# Altium PCB Pukk-Display-Module-v1.0.PcbDoc (part 1 of 5)
Units mil, origin at the board's own origin, x right, y up, seen from the top; angles counter-clockwise.
Board outline 3740.16 x 1574.8 mil, 4 copper layers (Top Layer, GND, POWER, Bottom Layer), stack 61.653 mil thick; 157 components, 115 nets, 640 pads, 314 vias.
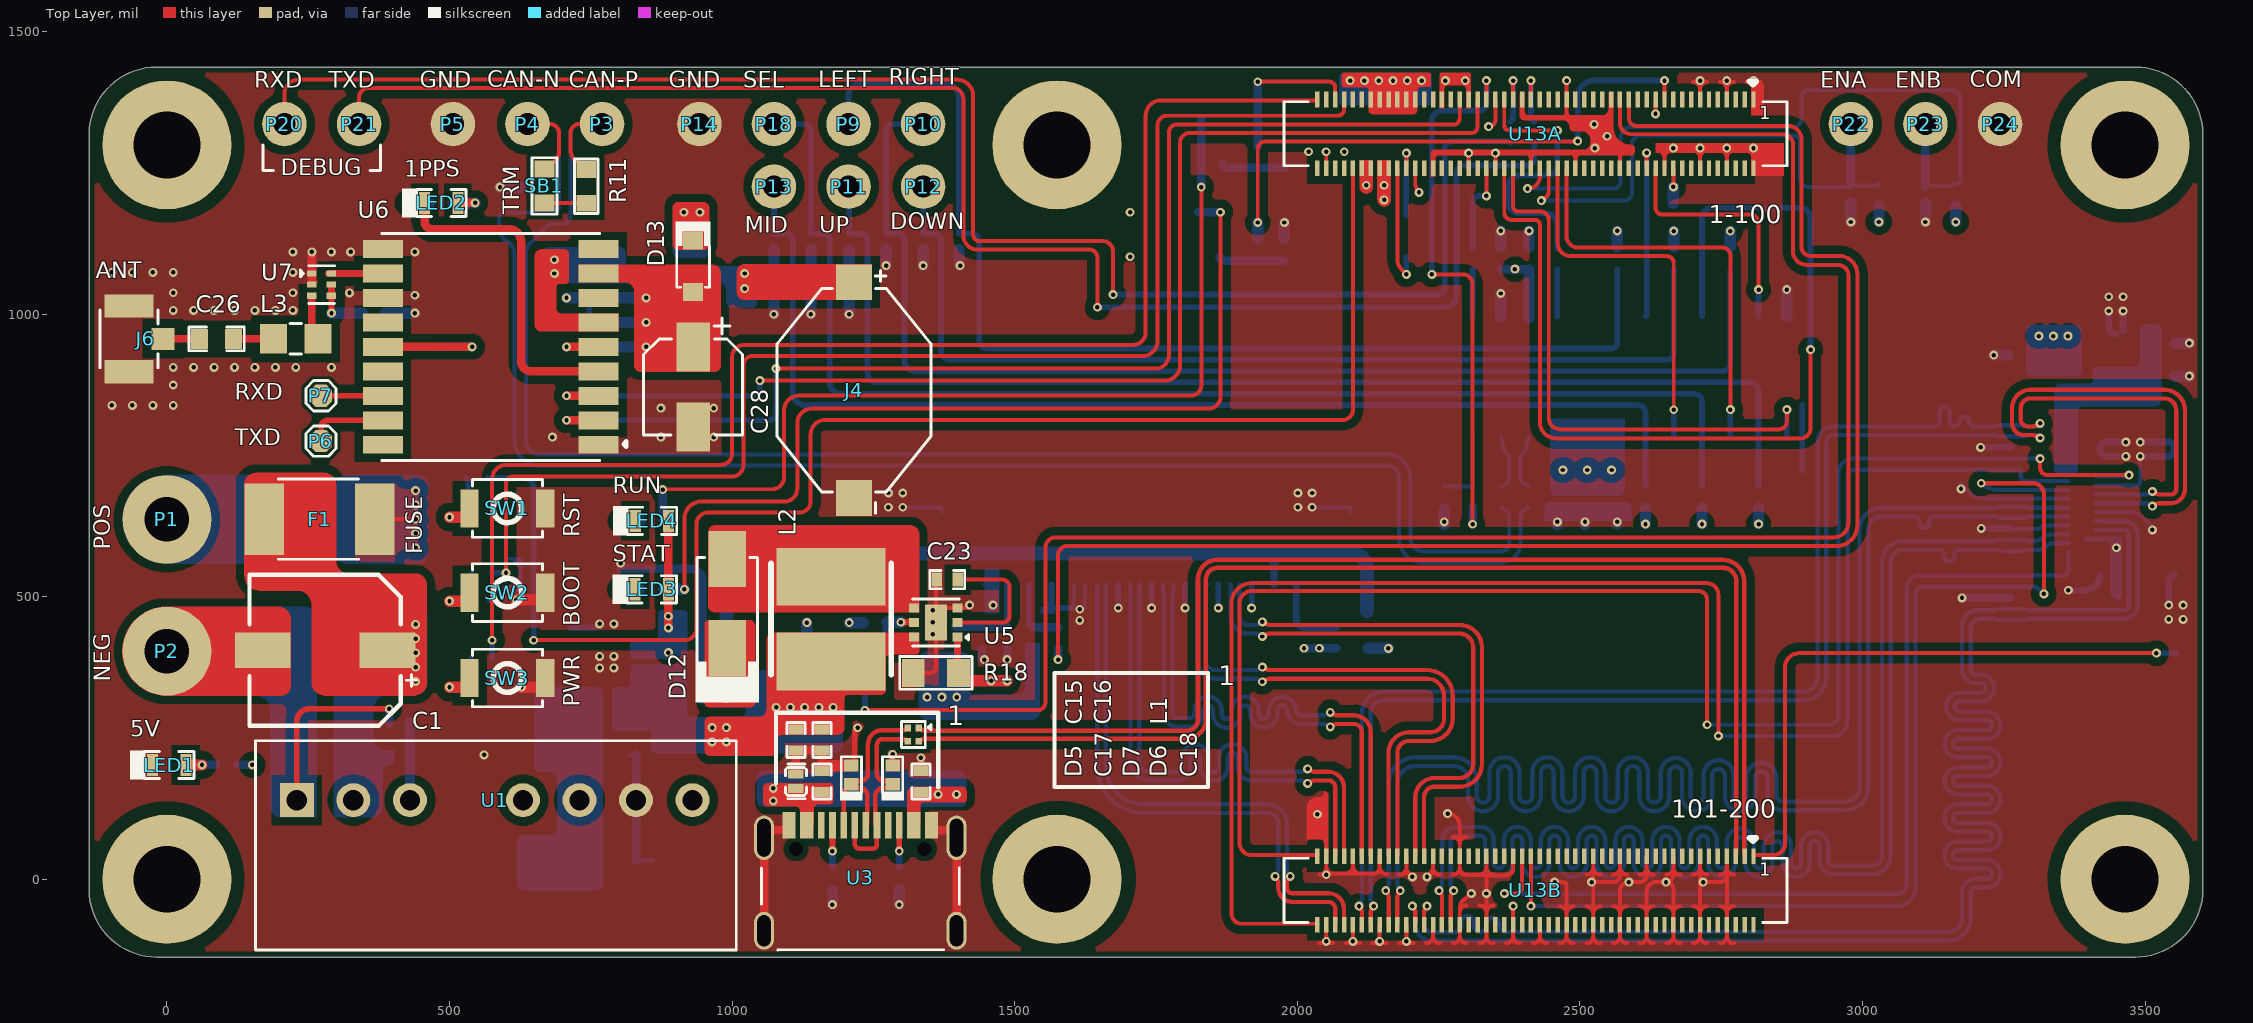
[diagram p0: Top Layer view]
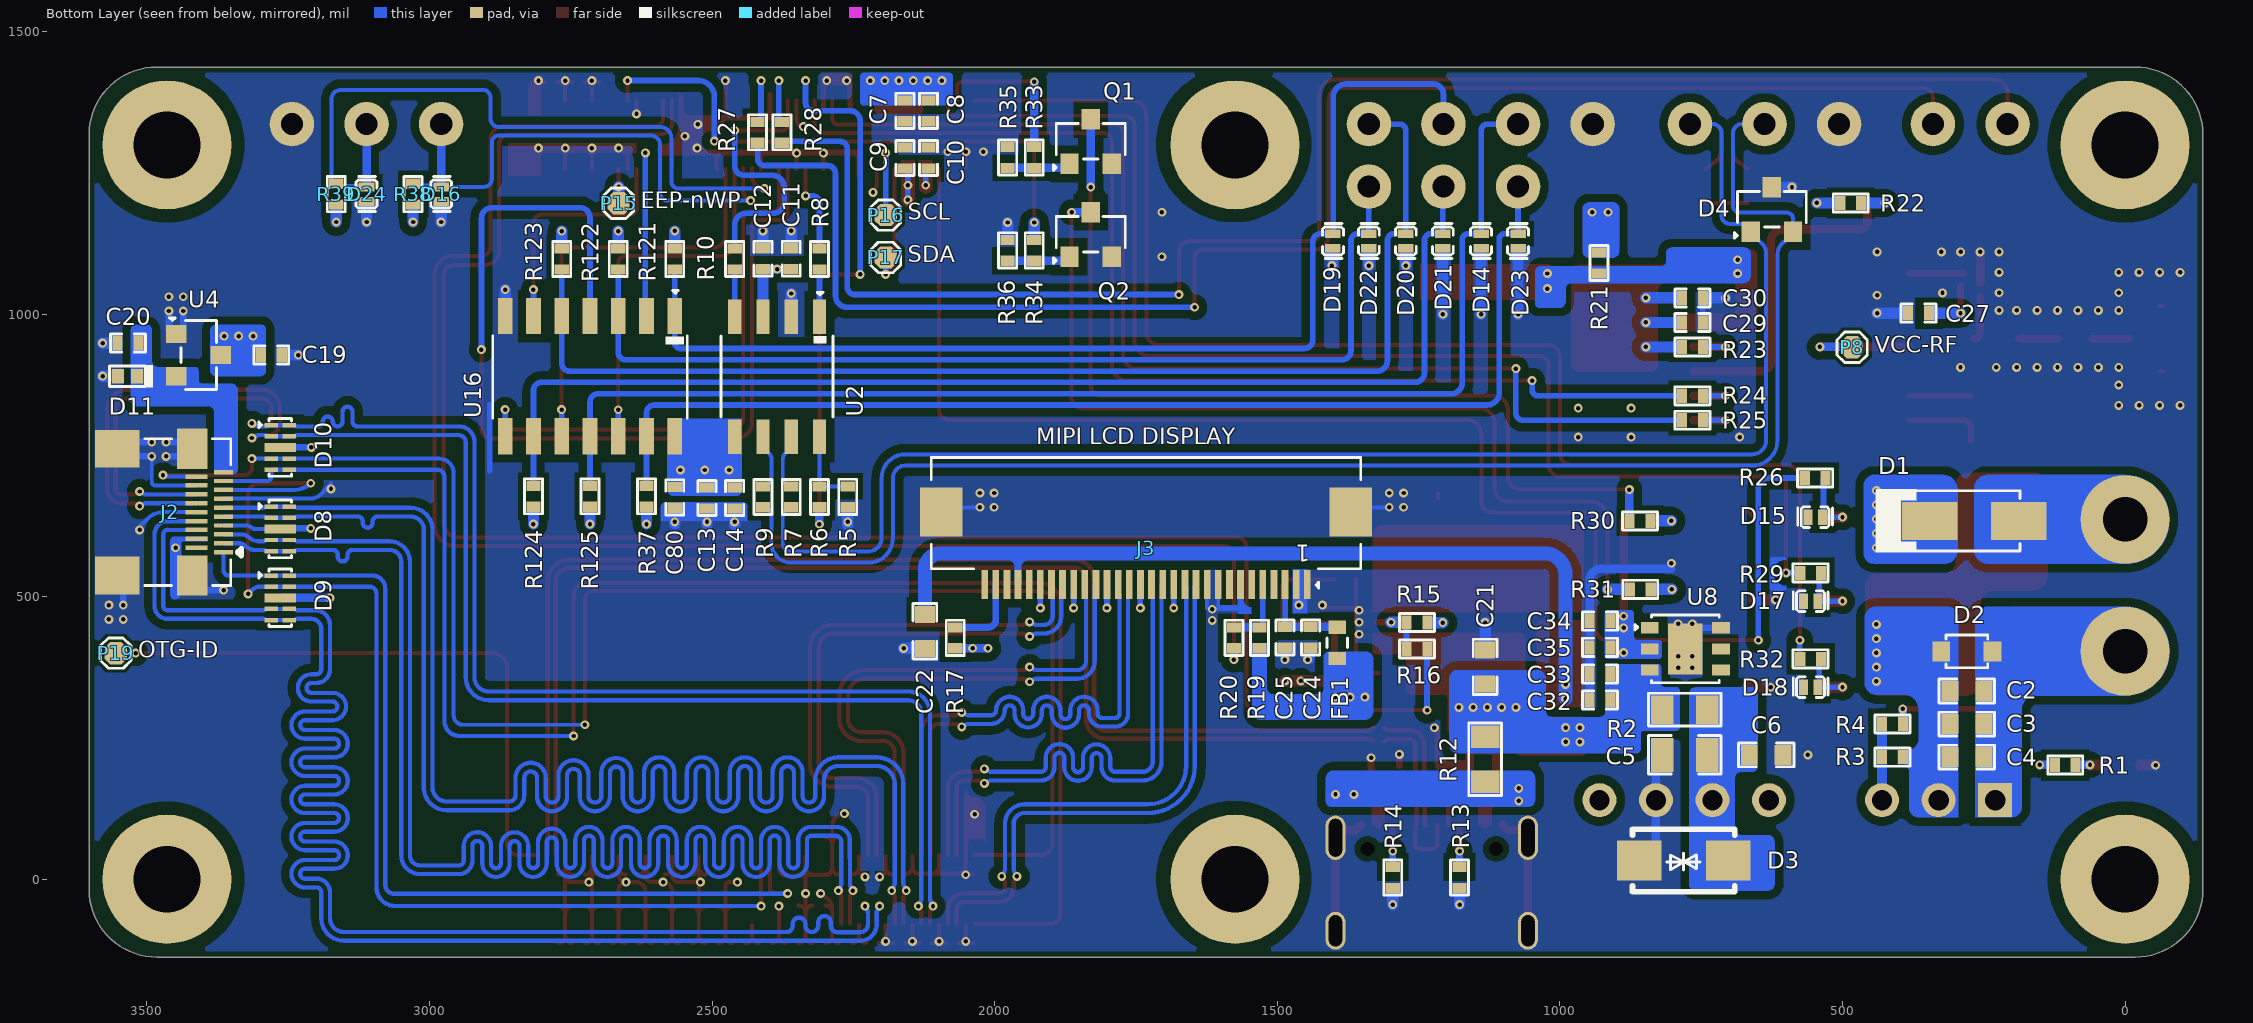
[diagram p1: Bottom Layer view, seen from below]
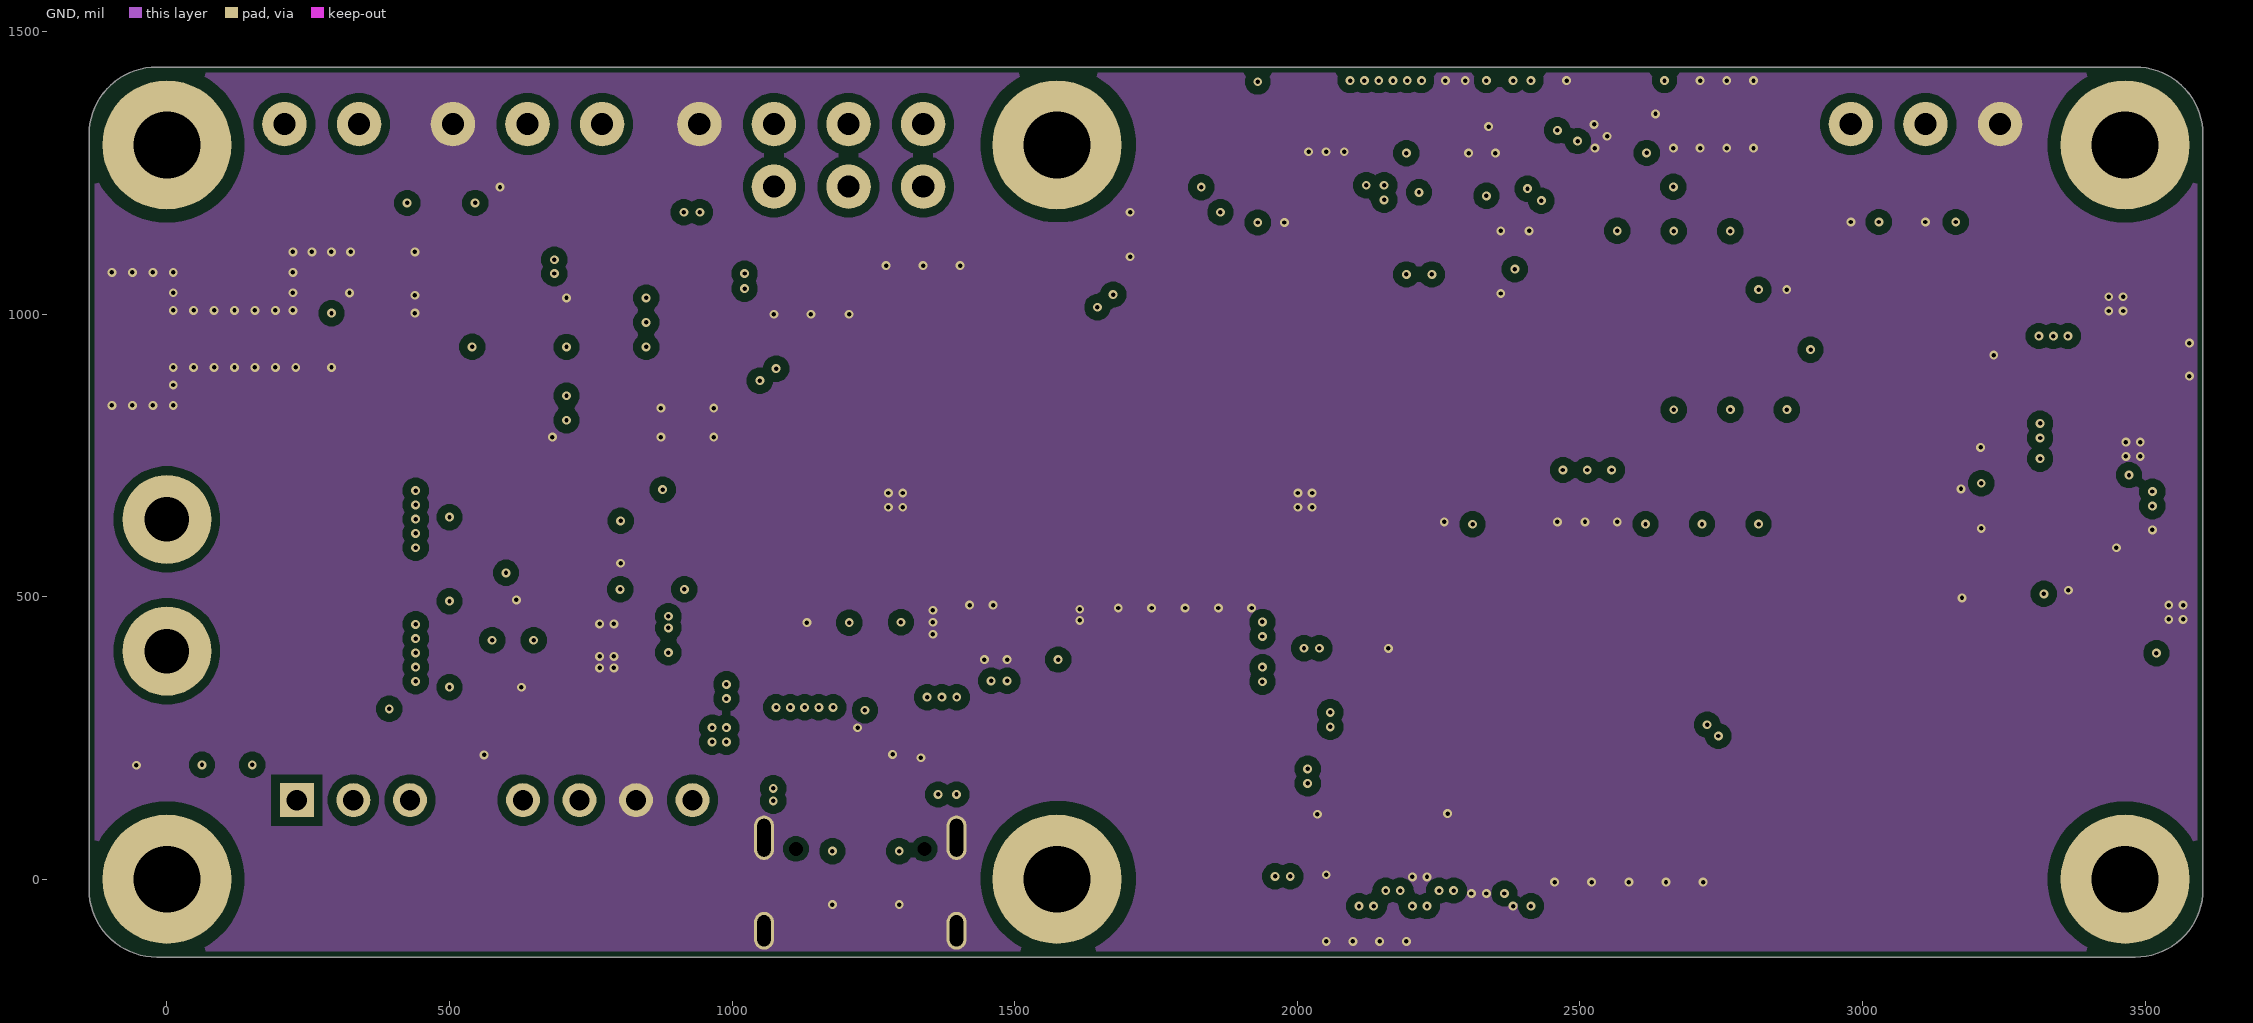
[diagram p2: GND]
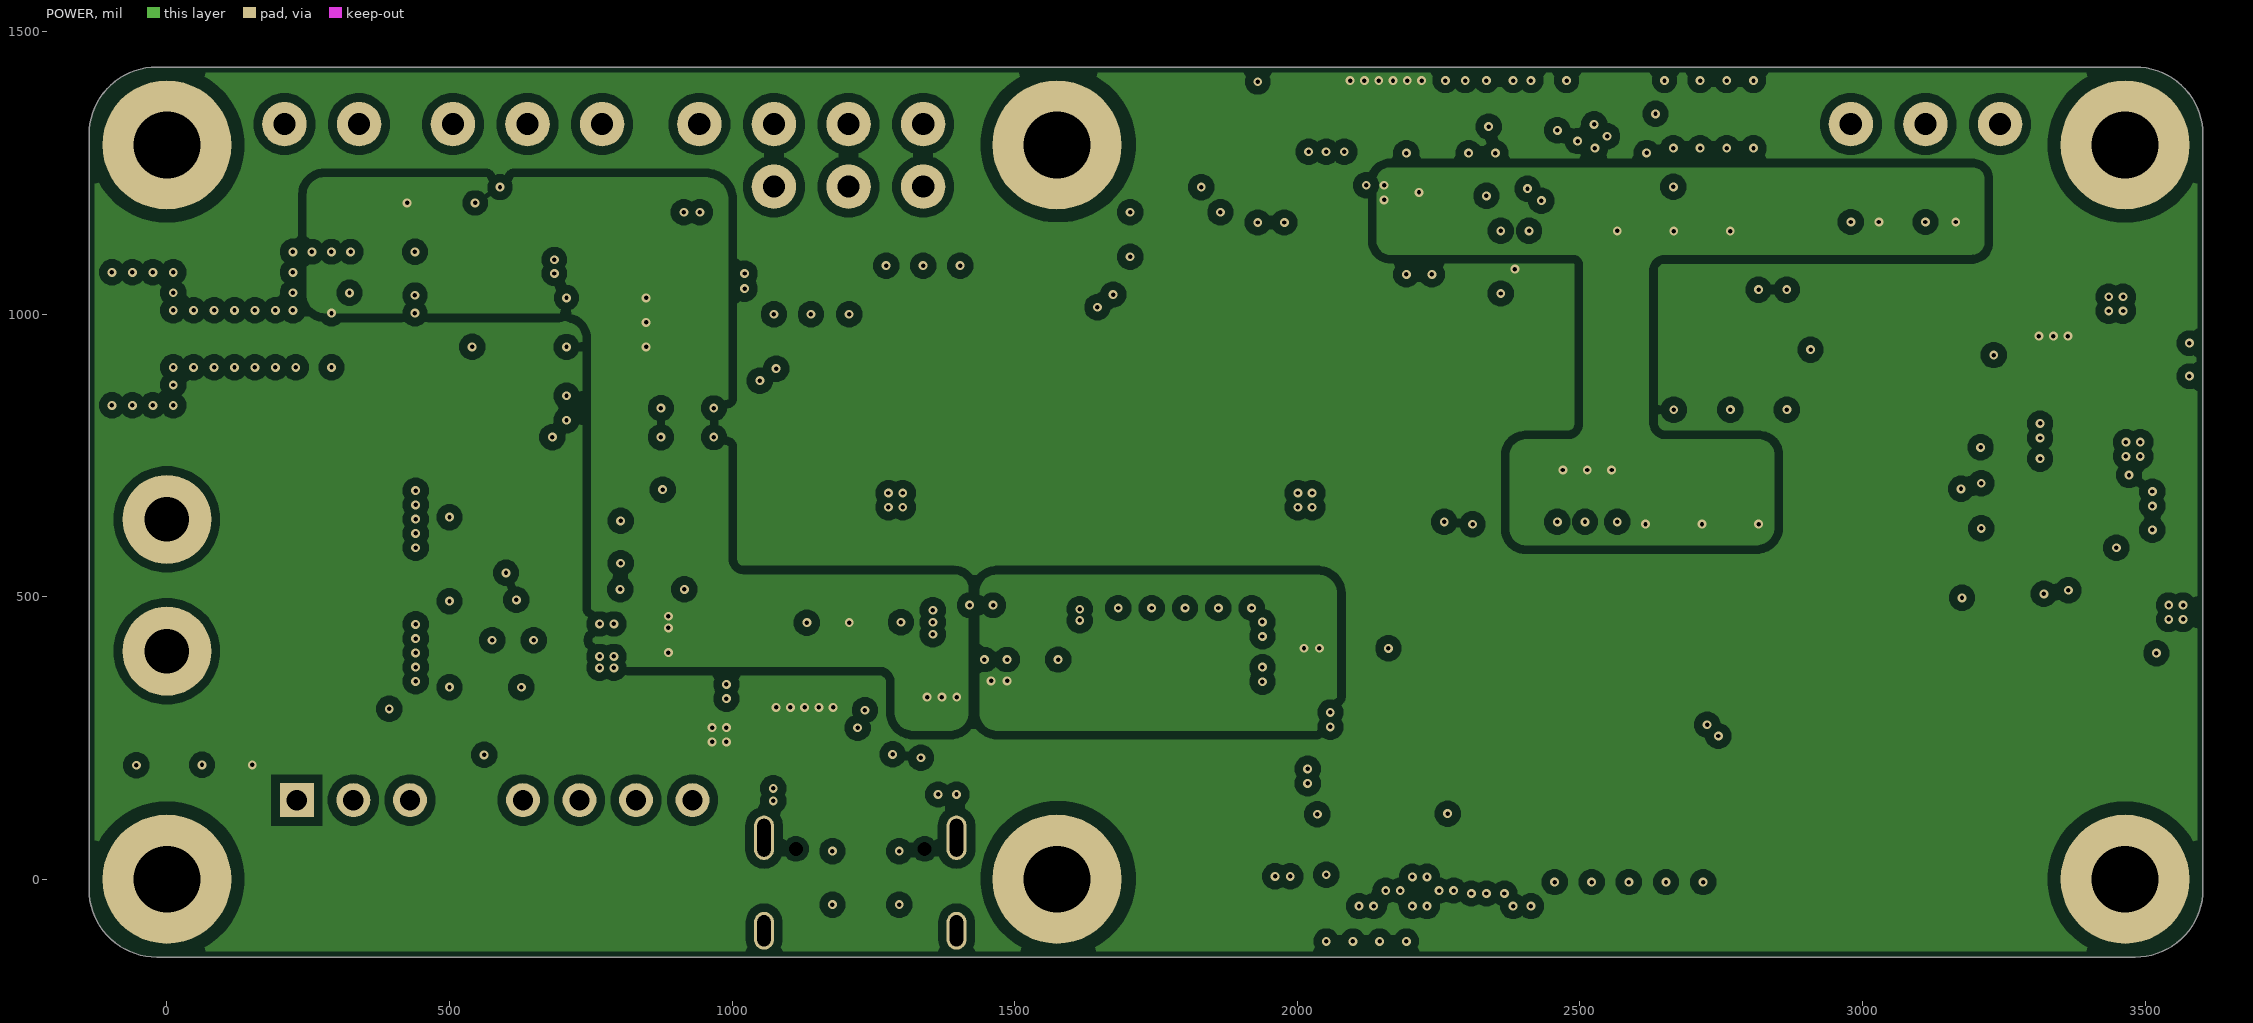
[diagram p3: POWER]
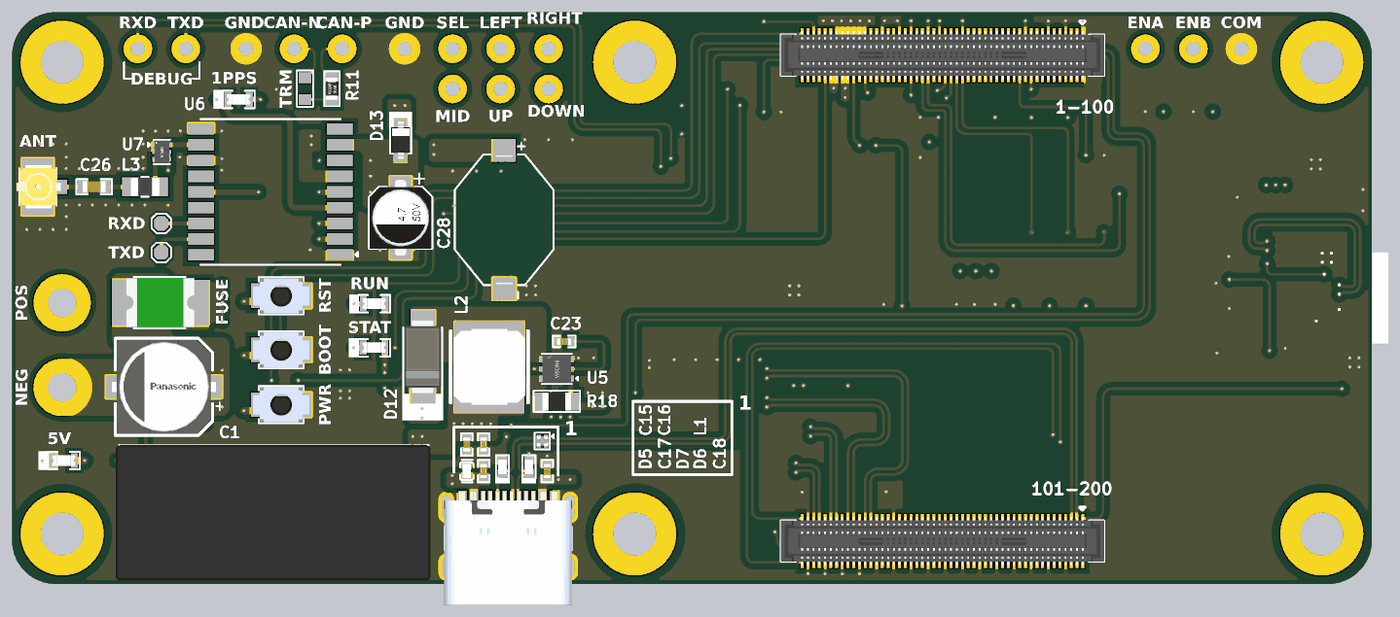
[diagram p6: 3D render of the assembled board from above, using the file's embedded part models]
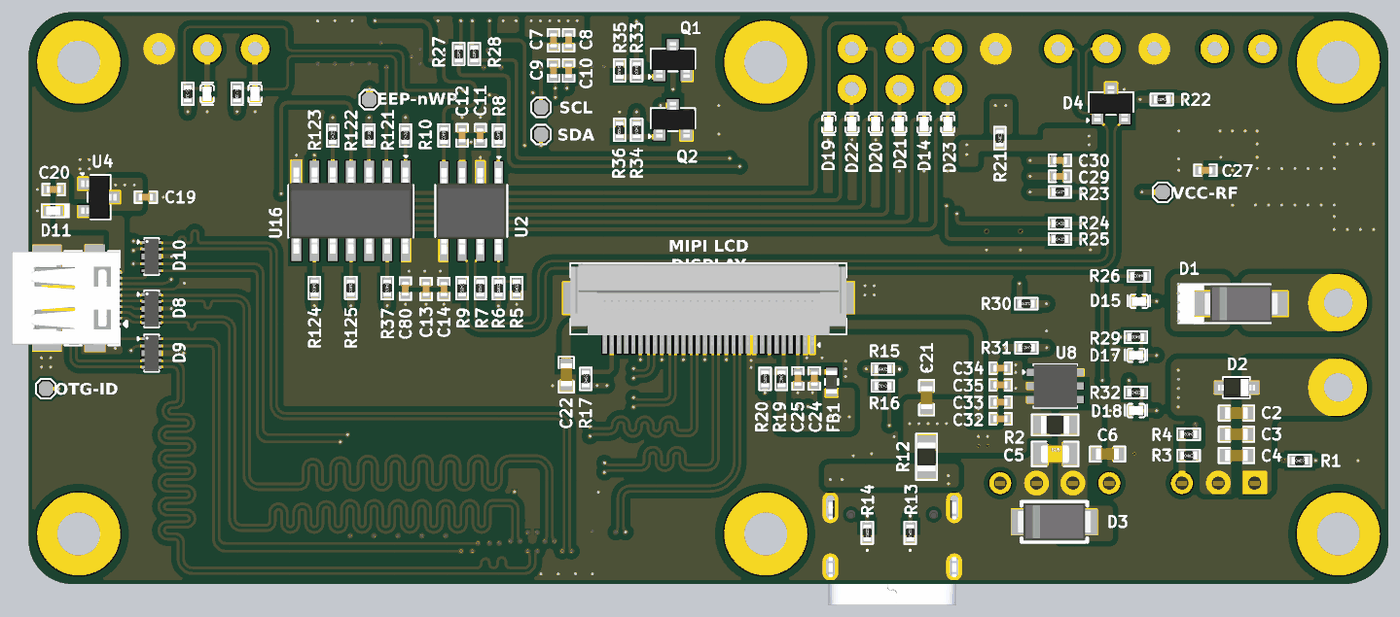
[diagram p7: 3D render of the assembled board from below, using the file's embedded part models]

## Layer stack, top to bottom
Top Solder: solder mask 0.4, Solder Resist, Dk 4
Top Layer: signal copper 1.378
Dielectric 2: prepreg 7.992, PP-006, Dk 4.74
GND: signal copper 1.181
Dielectric 1: dielectric 40.551, FR-4, Dk 4.6
POWER: signal copper 1.181
Dielectric 3: prepreg 7.992, PP-006, Dk 4.74
Bottom Layer: signal copper 1.378
Bottom Solder: solder mask 0.4, Solder Resist, Dk 4

## Board outline
-137.8,-17.8 ccw(c-17.8,-17.8) -17.8,-137.8 3482.36,-137.8 ccw(c3482.36,-17.8) 3602.36,-17.8 3602.36,1317.01 ccw(c3482.36,1317.01) 3482.36,1437.01 -17.8,1437.01 ccw(c-17.8,1317.01) -137.8,1317.01

## Design rules (kind name [scope] priority, off if disabled: settings)
BoardOutlineClearance [All] p1: gap=0 ignorepadtopadclearanceinfootprint=FALSE except(10: Arc-OutlineEdge Track-OutlineEdge SMDPad-OutlineEdge THPad-OutlineEdge Via-OutlineEdge Fill-OutlineEdge Poly-OutlineEdge)
Clearance [All] p1: gap=10 ignorepadtopadclearanceinfootprint=TRUE except(6: Arc-Arc Arc-Track Arc-SMDPad Track-Track Track-SMDPad; 7: Arc-Via Arc-Region Track-Via Track-Region SMDPad-SMDPad SMDPad-Via SMDPad-Region THPad-Region Via-Region Fill-Region Region-Region; 15: Arc-Poly Track-Poly SMDPad-Poly THPad-Poly Via-Poly Fill-Poly Poly-Poly Poly-Region)
ComponentClearance [All] p1: gap=0 collisioncheckmode=3 verticalgap=0 showdistances=FALSE
DiffPairsRouting DIFF_CAN [InDifferentialPairClass('CAN')] p1: maxlimit=13 minlimit=5 mostfreqgap=13 toplayer_mingap=13 toplayer_minwidth=7 toplayer_maxwidth=7 toplayer_prefwidth=7 midlayer1_maxgap=5 midlayer1_prefgap=5 midlayer1_minwidth=1.11 midlayer1_maxwidth=1.11 midlayer1_prefwidth=1.11 midlayer2_maxgap=5 midlayer2_prefgap=5 midlayer2_minwidth=1.11 midlayer2_maxwidth=1.11 midlayer2_prefwidth=1.11 bottomlayer_mingap=13 bottomlayer_minwidth=7 bottomlayer_maxwidth=7 bottomlayer_prefwidth=7 impedanceprofiledriven=TRUE impedanceprofileid={A054B856-2F00-47C0-A632-408A56F8DEFD} impedanceprofilevalue=120.000000 maxuncoupledlength=500
DiffPairsRouting DIFF_USB [InDifferentialPairClass('TYPEC_DP_LINES_90')] p2: maxlimit=10 minlimit=6 mostfreqgap=10 toplayer_maxgap=6 toplayer_prefgap=6 toplayer_minwidth=8 toplayer_maxwidth=8 toplayer_prefwidth=8 midlayer1_mingap=10 midlayer1_minwidth=7 midlayer1_maxwidth=7 midlayer1_prefwidth=7 midlayer2_mingap=10 midlayer2_minwidth=7 midlayer2_maxwidth=7 midlayer2_prefwidth=7 bottomlayer_maxgap=6 bottomlayer_prefgap=6 bottomlayer_minwidth=8 bottomlayer_maxwidth=8 bottomlayer_prefwidth=8 impedanceprofiledriven=TRUE impedanceprofileid={6258BFBA-6BE8-4BA7-A746-4562B6754B73} impedanceprofilevalue=90.000000 maxuncoupledlength=500
DiffPairsRouting DIFF_MIPI [InDifferentialPairClass('MIPI')] p3: maxlimit=16.5 minlimit=7.87 mostfreqgap=16.5 toplayer_maxgap=7.87 toplayer_prefgap=7.87 toplayer_minwidth=7.5 toplayer_maxwidth=7.5 toplayer_prefwidth=7.5 midlayer1_mingap=16.5 midlayer1_minwidth=7 midlayer1_maxwidth=7 midlayer1_prefwidth=7 midlayer2_mingap=16.5 midlayer2_minwidth=7 midlayer2_maxwidth=7 midlayer2_prefwidth=7 bottomlayer_maxgap=7.87 bottomlayer_prefgap=7.87 bottomlayer_minwidth=7.5 bottomlayer_maxwidth=7.5 bottomlayer_prefwidth=7.5 impedanceprofiledriven=TRUE impedanceprofileid={8DD942B3-6A09-4397-AC29-5C6056AFE4B1} impedanceprofilevalue=100.000000 maxuncoupledlength=500
DiffPairsRouting DIFF_HDMI [InDifferentialPairClass('HDMI_100R')] p4: maxlimit=16.5 minlimit=7.87 mostfreqgap=16.5 toplayer_maxgap=7.87 toplayer_prefgap=7.87 toplayer_minwidth=7.5 toplayer_maxwidth=7.5 toplayer_prefwidth=7.5 midlayer1_mingap=16.5 midlayer1_minwidth=7 midlayer1_maxwidth=7 midlayer1_prefwidth=7 midlayer2_mingap=16.5 midlayer2_minwidth=7 midlayer2_maxwidth=7 midlayer2_prefwidth=7 bottomlayer_maxgap=7.87 bottomlayer_prefgap=7.87 bottomlayer_minwidth=7.5 bottomlayer_maxwidth=7.5 bottomlayer_prefwidth=7.5 impedanceprofiledriven=TRUE impedanceprofileid={8DD942B3-6A09-4397-AC29-5C6056AFE4B1} impedanceprofilevalue=100.000000 maxuncoupledlength=500
HoleSize [All] p1: absolutevalues=TRUE maxlimit=500 minlimit=1 maxpercent=80.000 minpercent=20.000
MatchedLengths MIPI [InDifferentialPairClass('MIPI')] p1: tolerance=5 checknetsindiffpair=FALSE checkdiffpairvsdiffpair=TRUE checkxsignals=TRUE checkothers=TRUE
MatchedLengths HDMI [InDifferentialPairClass('HDMI_100R')] p2: tolerance=10 checknetsindiffpair=FALSE checkdiffpairvsdiffpair=TRUE checkxsignals=TRUE checkothers=TRUE
MaxMinImpedance "Schematic Impedance Constraint" [InDifferentialPairClass('MIPI')] p1: minimum=97.00 maximum=103.0
MinimumSolderMaskSliver [All] p1: minsoldermaskwidth=0
PolygonConnect [All] p1: connectstyle=Direct reliefconductorwidth=10 reliefentries=4 polygonreliefangle="90 Angle" airgapwidth=10
RoutingVias [All] p1: holewidth=11.81 width=23.62 viastyle="Through Hole" minholewidth=7.87 minwidth=15.75 maxholewidth=11.81 maxwidth=23.62
SilkToSilkClearance [All] p1: silktosilkclearance=0
SilkToSolderMaskClearance [IsPad] p1: minsilkscreentomaskgap=0 clearancetoexposedcopper=TRUE
SolderMaskExpansion [All] p1: expansion=4 istentingtop=FALSE
SupplyNets "Schematic Supply Nets_1" [InNet('GND')] p1: voltage=0.000
SupplyNets "Schematic Supply Nets_20" [InNet('VCC_1V8')] p2: voltage=0.000
SupplyNets "Schematic Supply Nets_19" [InNet('VUSB_5V')] p3: voltage=0.000
SupplyNets "Schematic Supply Nets_18" [InNet('VCC3V3_SYS')] p4: voltage=0.000
SupplyNets "Schematic Supply Nets_17" [InNet('VCC5V0_SYS')] p5: voltage=0.000
SupplyNets "Schematic Supply Nets_16" [InNet('VCC5V_HDMI')] p6: voltage=0.000
SupplyNets "Schematic Supply Nets_15" [InNet('VCC1V8')] p7: voltage=0.000
SupplyNets "Schematic Supply Nets_14" [InNet('LEDA')] p8: voltage=0.000
SupplyNets "Schematic Supply Nets_13" [InNet('VCC3V3')] p9: voltage=0.000
Width [All] p1: maxlimit=50 minlimit=7 preferedwidth=10 minimp=50.000000 maximp=50.000000 favimp=50.000000
24 further rules are at their usual default settings.

## Classes and differential pairs
differential pair class TYPEC_DP_LINES_90: USB_D USB_OTG0_D
differential pair class MIPI: MIPI_DSI_TX1_CLK MIPI_DSI_TX1_D0 MIPI_DSI_TX1_D1 MIPI_DSI_TX1_D2 MIPI_DSI_TX1_D3
differential pair class HDMI_100R: HDMI_TX0 HDMI_TX1 HDMI_TX2 HDMI_TXCLK
component class TYPE-C_INTERFACE_SHEET: C15 C16 C17 C18 D5 D6 D7 L1 R12 R13 R14 U3
component class radxa_CM3J_SHEET-2: P19 U13B
component class radxa_CM3J_SHEET-1: C7 C8 C9 C10 P15 P16 P17 R38 R39 U13A
component class POWER_SHEET: C1 C2 C3 C4 C5 C6 C32 C33 C34 C35 D1 D2 D3 F1 LED1 P1 P2 R1 R2 R3 R4 U1 U8
component class MISCELLANEOUS_SHEET: D15 D17 D18 LED3 LED4 P20 P21 Q1 Q2 R26 R27 R28 R29 R30 R31 R32 R33 R34 R35 R36 SW1 SW2 SW3
component class MIPI_DISPLAY-SHEET: C21 C22 C23 C24 C25 D12 FB1 J3 L2 R15 R16 R17 R18 R19 R20 U5
component class JOYSTICK_BUTTON_SHEET: C80 D14 D16 D19 D20 D21 D22 D23 D24 P9 P10 P11 P12 P13 P14 P18 P22 P23 P24 R37 R121 R122 R123 R124 R125 U16
component class HDMI2.0_SHEET: C19 C20 D8 D9 D10 D11 J2 U4
component class GPS_INTERFACE_SHEET: C26 C27 C28 C29 C30 D13 J4 J6 L3 LED2 P6 P7 P8 R21 R22 R23 R24 R25 U6 U7
component class CAN_SHEET: C11 C12 C13 C14 D4 P3 P4 P5 R5 R6 R7 R8 R9 R10 R11 SB1 U2
differential pair class CAN: CAN1 CAN2
differential pair USB_OTG0_D: +USB_OTG0_D_P -USB_OTG0_D_N
differential pair USB_D: +USB_D_P -USB_D_N
differential pair MIPI_DSI_TX1_D3: +MIPI_DSI_TX1_D3_P -MIPI_DSI_TX1_D3_N
differential pair MIPI_DSI_TX1_D2: +MIPI_DSI_TX1_D2_P -MIPI_DSI_TX1_D2_N
differential pair MIPI_DSI_TX1_D1: +MIPI_DSI_TX1_D1_P -MIPI_DSI_TX1_D1_N
differential pair MIPI_DSI_TX1_D0: +MIPI_DSI_TX1_D0_P -MIPI_DSI_TX1_D0_N
differential pair MIPI_DSI_TX1_CLK: +MIPI_DSI_TX1_CLK_P -MIPI_DSI_TX1_CLK_N
differential pair HDMI_TXCLK: +HDMI_TXCLK_P -HDMI_TXCLK_N
differential pair HDMI_TX2: +HDMI_TX2_P -HDMI_TX2_N
differential pair HDMI_TX1: +HDMI_TX1_P -HDMI_TX1_N
differential pair HDMI_TX0: +HDMI_TX0_P -HDMI_TX0_N
differential pair CAN1: +CAN1_P -CAN1_N

## Components (designator, comment, footprint, x,y, rotation, side; value= is the part's Value field where it differs from the comment)
C1 "47uF" 25SVPF47M 280,405 r180 top
C2 "10uF" Cap-0603 280,333 r0 bottom locked
C3 "1uF" Cap-0603 280,274.5 r0 bottom locked
C4 "0.1uF" Cap-0603 280,216 r0 bottom locked value=100nF
C5 "22uF" Cap-0805 779,220 r180 bottom locked
C6 "10uF" Cap-0603 635.01,220 r0 bottom locked
C7 "100nF" Cap-0402 2158.83,1359.5 r90 bottom locked
C8 "22uF" Cap-0402 2117.17,1359.5 r90 bottom locked
C9 "100nF" Cap-0402 2158.83,1276.06 r270 bottom locked
C10 "100nF" Cap-0402 2117.17,1276.06 r270 bottom locked
C11 "4.7uF" Cap-0402 2360,1097.85 r270 bottom locked
C12 "100nF" Cap-0402 2410,1097.85 r270 bottom locked
C13 "4.7uF" Cap-0402 2509,674.51 r90 bottom locked
C14 "100nF" Cap-0402 2460,674.51 r90 bottom locked
C15 "100nF" Cap-0402 1112.96,246.33 r90 top
C16 "10uF" Cap-0402 1159.22,246.33 r90 top
C17 "100nF" Cap-0402 1159.22,173.11 r270 top
C18 "10uF" Cap-0402 1334.26,173.11 r270 top
C19 "0.1uF" Cap-0402 3279.9,927.4 r0 bottom locked
C20 "0.1uF" Cap-0402 3533.33,948.54 r180 bottom locked
C21 "1uF" Cap-0603 1132.28,375.55 r270 bottom locked
C22 "1uF" Cap-0603 2123.44,438.59 r90 bottom locked
C23 "220nF" Cap-0402 1380.58,530 r0 top
C24 "4.7uF" Cap-0402 1440.94,427.9 r90 bottom locked
C25 "0.1uF" Cap-0402 1486.22,427.9 r270 bottom locked
C26 "100pF" Cap-0603 88,955.99 r180 top
C27 "0.1uF" Cap-0402 365.5,1001.46 r180 bottom locked
C28 "10uF" RVT1E100M0405_ 931,870.72 r270 top
C29 "0.1uF" Cap-0402 765.5,985.14 r0 bottom locked
C30 "33nF" Cap-0402 765.5,1028.54 r0 bottom locked
C32 "4.7uF" Cap-0402 929,317 r180 bottom locked
C33 "0.1uF" Cap-0402 929,363.05 r180 bottom locked
C34 "4.7uF" Cap-0402 929,456.59 r180 bottom locked
C35 "0.1uF" Cap-0402 929,410.29 r180 bottom locked
C80 "0.1uF" Cap-0402 2566,675.63 r270 bottom locked
D1 "SS56" SMA 267,634 r180 bottom locked
D2 "SD12C.TCT" "SOD-323 (Bi-directional)" 280,403 r0 bottom locked
D3 "SMAJ5.0CA" "SMA Bi Directional" 781,33 r180 bottom locked
D4 "CDSOT23-T24CAN-Q" SOT-23 625,1185 r180 bottom locked
D5 "ESD5451N" "DFN1006-2L (Bi-Directional)" 1112.96,173.11 r90 top
D6 "ESD5341N-2/TR" DFN1006-2L_ 1283.96,184.67 r90 top
D7 "ESD5341N-2/TR" DFN1006-2L_ 1211.02,184.67 r90 top
D8 "ESD5304D-10/TR" DFN2510-10L_ 3279.75,659.2 r180 bottom locked
D9 "ESD5304D-10/TR" DFN2510-10L_ 3279.75,537.25 r180 bottom locked
D10 "ESD5304D-10/TR" DFN2510-10L_ 3279.75,803.31 r180 bottom locked
D11 "ESD5341N-2/TR" DFN1006-2L_ 3534.33,890 r0 bottom locked
D12 "SS16" SMA 991.5,487.85 r90 top
D13 "B5819WS" SOD-323 931.01,1084.34 r270 top
D14 "ESD5451N" "DFN1006-2L (Bi-Directional)" 1139.5,1129.2 r90 bottom locked
D15 "ESD5451N" "DFN1006-2L (Bi-Directional)" 548.37,640.64 r0 bottom locked
D16 "ESD5451N" "DFN1006-2L (Bi-Directional)" 2979.37,1212.2 r90 bottom
D17 "ESD5451N" "DFN1006-2L (Bi-Directional)" 556.37,492 r0 bottom locked
D18 "ESD5451N" "DFN1006-2L (Bi-Directional)" 556.37,339.75 r0 bottom locked
D19 "ESD5451N" "DFN1006-2L (Bi-Directional)" 1401.5,1129.2 r90 bottom locked
D20 "ESD5451N" "DFN1006-2L (Bi-Directional)" 1272.5,1129.2 r90 bottom locked
D21 "ESD5451N" "DFN1006-2L (Bi-Directional)" 1207,1129.2 r90 bottom locked
D22 "ESD5451N" "DFN1006-2L (Bi-Directional)" 1338,1129.2 r90 bottom locked
D23 "ESD5451N" "DFN1006-2L (Bi-Directional)" 1074,1129.2 r90 bottom locked
D24 "ESD5451N" "DFN1006-2L (Bi-Directional)" 3111.37,1212.2 r90 bottom
F1 "BSMD1812-150-33V" Fuse-1812_ 270,637 r180 top
FB1 "BLM18PG181SN1D" "IND-0603 (1608 Metric)" 1394,418.03 r90 bottom locked
J2 "HDMI-101W" HDMI-101W 3458.26,649.45 r270 bottom locked
J3 "TF31-30S-0.5SH(800)" TF31-30S-0.5SH(800) 1732.28,585.63 r0 bottom locked
J4 "PB-621SR13-TF" PB-621SR13-TF 1215.72,865.36 r270 top
J6 "U.FL-R-SMT-1(10)" U.FL-R-SMT-1(10) -37,956 r90 top
L1 "SDMM0806H-2-900T" 0302 1320.58,255.83 r0 top
L2 "22uH" VLCF5020T-220MR75-1 1175,460.23 r90 top
L3 "6.8nH" Ind-0805 228,955.99 r180 top
LED1 "RED" LED-0603 4,202 r180 top
LED2 "Emerald" LED-0603 485.37,1196.46 r180 top
LED3 "Yellow" LED-0603 857.77,512.86 r180 top
LED4 "Red" LED-0603 858.18,634 r180 top
P1 "0.5mm Test Pad" "0.5mm Test Pad"#1 0,636.54 r0 top locked
P2 "0.5mm Test Pad" "0.5mm Test Pad"#1 0,403.5 r0 top locked
P3 "0.5mm Test Pad" "0.5mm Test Pad"#2 770,1336 r0 top locked
P4 "0.5mm Test Pad" "0.5mm Test Pad"#2 638,1336 r0 top locked
P5 "0.5mm Test Pad" "0.5mm Test Pad"#2 506,1336 r0 top locked
P6 "TEST POINT 0.5mm Dia" "Test-point - 0.5mm" 272.64,775.21 r90 top
P7 "TEST POINT 0.5mm Dia" "Test-point - 0.5mm" 272.64,855.21 r90 top
P8 "TEST POINT 0.5mm Dia" "Test-point - 0.5mm" 483,941 r90 bottom locked
P9 "0.5mm Test Pad" "0.5mm Test Pad"#2 1206,1336 r0 top locked
P10 "0.5mm Test Pad" "0.5mm Test Pad"#2 1338,1336 r90 top locked
P11 "0.5mm Test Pad" "0.5mm Test Pad"#2 1206,1225.4 r90 top locked
P12 "0.5mm Test Pad" "0.5mm Test Pad"#2 1338,1225.4 r90 top locked
P13 "0.5mm Test Pad" "0.5mm Test Pad"#2 1074,1225.4 r90 top locked
P14 "0.5mm Test Pad" "0.5mm Test Pad"#2 942,1336 r90 top locked
P15 "TEST POINT 0.5mm Dia" "Test-point - 0.5mm" 2665.35,1196 r90 bottom locked
P16 "TEST POINT 0.5mm Dia" "Test-point - 0.5mm" 2192.91,1175 r90 bottom locked
P17 "TEST POINT 0.5mm Dia" "Test-point - 0.5mm" 2192.91,1100 r90 bottom locked
P18 "0.5mm Test Pad" "0.5mm Test Pad"#2 1074,1336 r90 top locked
P19 "TEST POINT 0.5mm Dia" "Test-point - 0.5mm" 3555,400 r90 bottom locked
P20 "0.5mm Test Pad" "0.5mm Test Pad"#2 208,1336 r90 top locked
P21 "0.5mm Test Pad" "0.5mm Test Pad"#2 340,1336 r90 top locked
P22 "0.5mm Test Pad" "0.5mm Test Pad"#2 2979.37,1336 r90 top locked
P23 "0.5mm Test Pad" "0.5mm Test Pad"#2 3111.37,1336 r90 top locked
P24 "0.5mm Test Pad" "0.5mm Test Pad"#2 3243.37,1336 r0 top locked
Q1 "S8050" SOT-23 1830.1,1305 r180 bottom locked
Q2 "S8050" SOT-23 1830.1,1140.63 r180 bottom locked
R1 "499R" Res-0402 106,202 r180 bottom locked
R2 "0R" Res-0805 779,300 r0 bottom locked
R3 "10K" Res-0402 411.5,216 r180 bottom locked
R4 "6.8K" Res-0402 411.5,274.5 r0 bottom locked value=6.8kR
R5 "4.7K" Res-0402 2260,676.5 r90 bottom locked
R6 "0R" Res-0402 2310,676.5 r90 bottom locked
R7 "0R" Res-0402 2360,676.5 r270 bottom locked
R8 "0R" Res-0402 2310,1097.5 r270 bottom locked
R9 "0R" Res-0402 2410,676.5 r270 bottom locked
R10 "0R" Res-0402 2460,1097.5 r270 bottom locked
R11 "120R" Res-0603 742,1226 r90 top
R12 "DNP" Res-0805 1132.28,212.23 r270 bottom locked
R13 "5.1K" Res-0402 1177.56,3.23 r90 bottom locked
R14 "5.1K" Res-0402 1295.67,3.23 r90 bottom locked
R15 "1K" Res-0402 1252.96,454.23 r180 bottom locked
R16 "DNP" Res-0402 1252.96,407.23 r0 bottom locked
R17 "0R" Res-0402 2069.82,427.09 r90 bottom locked
R18 "5.1R" RES-0805 1360.58,365 r0 top
R19 "10K" Res-0402 1531.5,427.09 r270 bottom locked
R20 "DNP" Res-0402 1576.74,427.09 r90 bottom locked
R21 "1.5K" Res-0402 931.01,1090.19 r90 bottom locked
R22 "100R" Res-0402 485.37,1196.46 r0 bottom locked
R23 "0R" Res-0402 765.5,941.74 r180 bottom locked
R24 "0R" Res-0402 765.5,855.31 r180 bottom locked
R25 "0R" Res-0402 765.5,812 r180 bottom locked
R26 "100R" Res-0402 548.37,709.86 r0 bottom locked
R27 "0R" Res-0402 2419.46,1321.5 r270 bottom locked
R28 "0R" Res-0402 2376.46,1321.5 r270 bottom locked
R29 "100R" Res-0402 556.37,542 r0 bottom locked
R30 "100R" Res-0402 858.18,634 r0 bottom locked
R31 "100R" Res-0402 857.77,512.86 r0 bottom locked
R32 "0R" Res-0402 556.37,389.86 r180 bottom locked
R33 "10K" Res-0402 1930,1277.02 r270 bottom locked
R34 "10K" Res-0402 1930,1112.65 r270 bottom locked
R35 "100K" Res-0402 1977,1277.02 r270 bottom locked
R36 "100K" Res-0402 1977,1112.65 r270 bottom locked
R37 "1K" Res-0402 2616,677.63 r270 bottom locked
R38 "4.7K" Res-0402 3029,1212.03 r270 bottom
R39 "4.7K" Res-0402 3165,1212.03 r270 bottom
R121 "1K" Res-0402 2566,1097.5 r90 bottom locked
R122 "1K" Res-0402 2666,1097.5 r90 bottom locked
R123 "1K" Res-0402 2766,1097.5 r90 bottom locked
R124 "1K" Res-0402 2816,677.63 r270 bottom locked
R125 "1K" Res-0402 2716,677.63 r270 bottom locked
SB1 "Solder Bridge 0603" "Solder Bridge" 668,1226.51 r270 top
SW1 "B3U-1000P" B3U-1000P 602.51,656 r0 top
SW2 "B3U-1000P" B3U-1000P 602.51,507 r0 top
SW3 "B3U-1000P" B3U-1000P 602.51,356 r0 top
U1 "VRB1205S-10WR3" VRB1205S-10WR3 580,140 r0 top locked
U2 "TCAN1044VDRQ1" "SOIC-8(0.154\", 3.90mm Width)" 2385,889 r270 bottom locked
U3 "TYPE-C-31-M-12" TYPE-C-31-M-12_ 1226.77,2.23 r0 top locked
U4 "AP2331SA-7" SOT-23 3408.83,927.4 r270 bottom locked
U5 "TPS61161ADRVR" WSON-6-EP(2x2) 1360.58,454.23 r180 top
U6 "ATGM336H-6N-74" ATGM336H-6N-74 572.94,941.77 r0 top
U7 "AT2659" DFN-6(1x1.6) 273.77,1052.01 r0 top
U8 "ST1L05APU33R" DFN-6(3x3) 778.19,407.49 r180 bottom locked
U13A "DF40C-30DP-0.4V(51)" DF40C-100DS-0.4V(51) 2807.09,1379.52 r0 top locked
U13B "DF40C-30DP-0.4V(51)" DF40C-100DS-0.4V(51) 2807.09,40.94 r0 top locked
U16 "SN74HC14QDRQ1" SOIC-14 2716,890 r270 bottom locked

## Footprints (in the part's own frame and the unit in brackets; to place one, negate y for a bottom-side part, rotate by r counter-clockwise, add the part's x,y. Pads: shape width x height; smd on the part's side, far side on the other; paste and mask are expansions set on the pad)
"0.5mm Test Pad"#1 [mm]
  round 4 hole 2: 1(0,0)
"0.5mm Test Pad"#2 [mm]
  round 2 hole 1: 1(0,0)
25SVPF47M [mm]
  rect 2.5x1.6 smd: 1(-2.8,0) 2(2.8,0)
  silkscreen extent -4.11,-3.4 3.4,3.4, body extent -3.65,-3.3 3.65,3.3, height 6
0302 [mm]
  rect 0.3x0.3 smd paste+0 mask+0.051: 1(0.25,0.3) 2(0.25,-0.3) 3(-0.25,0.3) 4(-0.25,-0.3)
  silkscreen extent -0.53,-0.58 0.8,0.58, body extent -0.42,-0.34 0.44,0.33, height 0.42
ATGM336H-6N-74 [mm]
  rect 1.8x0.8 smd: 1(4.85,-4.4) 2(4.85,-3.3) 3(4.85,-2.2) 4(4.85,-1.1) 5(4.85,0) 6(4.85,1.1) 7(4.85,2.2) 8(4.85,3.3) 9(4.85,4.4) 10(-4.85,4.4) 11(-4.85,3.3) 12(-4.85,2.2) 13(-4.85,1.1) 14(-4.85,0) 15(-4.85,-1.1) 16(-4.85,-2.2) 17(-4.85,-3.3) 18(-4.85,-4.4)
  silkscreen extent -4.9,-5.1 6.1,5.1, body extent -4.85,-5.05 4.85,5.05, height 2.57
B3U-1000P [mm] "SWITCH TACTILE SPST-NO 0.05A 12V"
  rect 0.82x1.72 smd: 1(-1.7,0) 2(1.7,0)
  silkscreen extent -1.57,-1.3 1.57,1.3, body extent -2,-1.26 2,1.24, height 1.6
Cap-0402 [mil]
  rect 18x25 smd mask+2.36: 1(-18.5,0) 2(18.5,0)
  silkscreen extent -31,-16 31,16, body extent -20,-10 20,10, height 19
Cap-0603 [mil]
  rect 30x35 smd mask+2.36: 1(-30,0) 2(30,0)
  silkscreen extent -49,-21 49,21, body extent -32,-16 31,16, height 34
Cap-0805 [mil] "SMD 0805"
  rect 40x60 smd mask+2.76: 1(-40,0) 2(40,0)
  silkscreen extent -64,-34 64,34, body extent -39,-25 39,25, height 30
DF40C-100DS-0.4V(51) [mm]
  rect 0.2x0.7 smd paste-1: 1(0,0) 2(0,-3.08) 3(-0.4,0) 4(-0.4,-3.08) 5(-0.8,0) 6(-0.8,-3.08) 7(-1.2,0) 8(-1.2,-3.08) 9(-1.6,0) 10(-1.6,-3.08) 11(-2,0) 12(-2,-3.08) 13(-2.4,0) 14(-2.4,-3.08) 15(-2.8,0) 16(-2.8,-3.08) 17(-3.2,0) 18(-3.2,-3.08) 19(-3.6,0) 20(-3.6,-3.08) 21(-4,0) 22(-4,-3.08) 23(-4.4,0) 24(-4.4,-3.08) 25(-4.8,0) 26(-4.8,-3.08) 27(-5.2,0) 28(-5.2,-3.08) 29(-5.6,0) 30(-5.6,-3.08) 31(-6,0) 32(-6,-3.08) 33(-6.4,0) 34(-6.4,-3.08) 35(-6.8,0) 36(-6.8,-3.08) 37(-7.2,0) 38(-7.2,-3.08) 39(-7.6,0) 40(-7.6,-3.08) 41(-8,0) 42(-8,-3.08) 43(-8.4,0) 44(-8.4,-3.08) 45(-8.8,0) 46(-8.8,-3.08) 47(-9.2,0) 48(-9.2,-3.08) 49(-9.6,0) 50(-9.6,-3.08) 51(-10,0) 52(-10,-3.08) 53(-10.4,0) 54(-10.4,-3.08) 55(-10.8,0) 56(-10.8,-3.08) 57(-11.2,0) 58(-11.2,-3.08) 59(-11.6,0) 60(-11.6,-3.08) 61(-12,0) 62(-12,-3.08) 63(-12.4,0) 64(-12.4,-3.08) 65(-12.8,0) 66(-12.8,-3.08) 67(-13.2,0) 68(-13.2,-3.08) 69(-13.6,0) 70(-13.6,-3.08) 71(-14,0) 72(-14,-3.08) 73(-14.4,0) 74(-14.4,-3.08) 75(-14.8,0) 76(-14.8,-3.08) 77(-15.2,0) 78(-15.2,-3.08) 79(-15.6,0) 80(-15.6,-3.08) 81(-16,0) 82(-16,-3.08) 83(-16.4,0) 84(-16.4,-3.08) 85(-16.8,0) 86(-16.8,-3.08) 87(-17.2,0) 88(-17.2,-3.08) 89(-17.6,0) 90(-17.6,-3.08) 91(-18,0) 92(-18,-3.08) 93(-18.4,0) 94(-18.4,-3.08) 95(-18.8,0) 96(-18.8,-3.08) 97(-19.2,0) 98(-19.2,-3.08) 99(-19.6,0) 100(-19.6,-3.08)
  silkscreen extent -21.1,-2.98 1.5,0.81, body extent -21.1,-3.23 1.5,0.15, height 1.6
"DFN1006-2L (Bi-Directional)" [mm]
  rect 0.4x0.7 smd paste+0 mask+0.051: 1(-0.325,0) 2(0.325,0)
  silkscreen extent -0.78,-0.47 0.78,0.47, body extent -0.5,-0.3 0.5,0.3, height 0.47
DFN1006-2L_ [mm]
  rect 0.55x0.66 smd: 1(-0.425,0) 2(0.425,0)
  silkscreen extent -1.14,-0.51 0.81,0.51, body extent -0.5,-0.3 0.5,0.3, height 0.47
DFN2510-10L_ [mm]
  rect 0.6x0.2 smd: 1(0,0) 2(0,-0.5) 4(0,-1.5) 5(0,-2) 6(0.8,-2) 7(0.8,-1.5) 9(0.8,-0.5) 10(0.8,0)
  rect 1.4x0.4 smd: 3_8(0.4,-1)
  silkscreen extent -0.57,-2.3 0.91,0.3, body extent -0.1,-2.25 0.9,0.25, height 0.55
DFN-6(1x1.6) [mm]
  rect 0.425x0.28 smd: 1(-0.437,0.5) 2(-0.437,0) 3(-0.437,-0.5) 4(0.437,-0.5) 5(0.437,0) 6(0.437,0.5)
  silkscreen extent -0.96,-0.85 0.58,0.85, body extent -0.54,-0.8 0.55,0.8, height 0.86
DFN-6(3x3) [mm]
  rect 0.8x0.5 smd paste+0 mask+0.051: 1(-1.6,0.95) 2(-1.6,0) 3(-1.6,-0.95) 4(1.6,-0.95) 5(1.6,0) 6(1.6,0.95)
  rect 1.55x2.3 smd paste+0 mask+0.051: 7(0,0)
  silkscreen extent -2.26,-1.52 1.52,1.52, body extent -1.5,-1.5 1.5,1.5, height 1.04
Fuse-1812_ [mm]
  rect 1.78x3.2 smd: 1(-2.49,0) 2(2.49,0)
  silkscreen extent -1.75,-1.8 1.85,1.8, body extent -2.36,-1.74 2.37,1.74, height 1.03
HDMI-101W [mm]
  rect 0.2x0.84 smd paste+0 mask+0.051: 1(1.8,2.385) 3(1.4,2.385) 5(1,2.385) 7(0.6,2.385) 9(0.2,2.385) 11(-0.2,2.385) 13(-0.6,2.385) 15(-1,2.385) 17(-1.4,2.385) 19(-1.8,2.385)
  rect 0.2x1 smd paste+0 mask+0.051: 2(1.6,1.165) 4(1.2,1.165) 6(0.8,1.165) 8(0.4,1.165) 10(0,1.165) 12(-0.4,1.165) 14(-0.8,1.165) 16(-1.2,1.165) 18(-1.6,1.165)
  rect 1.7x2 smd paste+0 mask+0.051: 20(-2.85,-2.385) 20(2.85,-2.385)
  rect 1.8x1.38 smd paste+0 mask+0.051: 20(-2.85,0.975) 20(2.85,0.975)
  silkscreen extent -3.3,-1.15 3.3,3.17, body extent -3.25,-4.81 3.26,2.69, height 3.1
"IND-0603 (1608 Metric)" [mm] "0.063\" L x 0.032\" W (1.60mm x 0.80mm)"
  rect 0.6x0.8 smd: 1(-0.7,0) 2(0.7,0)
  silkscreen extent -0.2,-0.46 0.23,0.46, body extent -0.8,-0.4 0.8,0.4, height 0.78
Ind-0805 [mm] "Inductor 0805"
  rect 1.2x1.32 smd: 1(-1,0) 2(1,0)
  silkscreen extent -0.25,-0.69 0.25,0.69, body extent -1,-0.62 1,0.63, height 0.47
LED-0603 [mm]
  rect 0.5x1 smd: 1(-0.75,0) 2(0.75,0)
  silkscreen extent -1.12,-0.66 1.75,0.66, body extent -0.82,-0.37 0.82,0.36, height 0.68
PB-621SR13-TF [mm]
  rect 1.6x1.6 smd: 1(-4.85,0) 2(4.85,0)
  silkscreen extent -5.37,-3.45 5.53,3.45, body extent -5.29,-3.35 5.29,3.35, height 2.9
Res-0402 [mil]
  rect 18x25 smd mask+2.17: 1(-18.5,0) 2(18.5,0)
  silkscreen extent -32,-17 32,16, body extent -23,-11 23,11, height 16
Res-0603 [mil]
  rect 30x35 smd: 1(-30,0) 2(30,0)
  silkscreen extent -48,-21 48,21, body extent -31,-17 31,17, height 18
Res-0805 [mil] "SMD 0805"
  rect 40x50 smd: 1(-40,0) 2(40,0)
  silkscreen extent -64,-29 64,29, body extent -39,-25 39,24, height 24
RES-0805 [mil] "SMD 0805"
  rect 40x50 smd: 1(-40,0) 2(40,0)
  silkscreen extent -64,-29 64,29, body extent -39,-25 39,24, height 24
RVT1E100M0405_ [mm] "10uF 25V 5.4mm SMD"
  rect 2.2x1.5 smd: 1(-1.8,0) 2(1.8,0)
  silkscreen extent -3.1,-2.22 2.16,2.22, body extent -2.65,-2.15 2.65,2.15, height 5.7
SMA [mm]
  rect 2.5x1.7 smd: 1(-2,0) 2(2,0)
  silkscreen extent -4.45,-1.42 2.06,1.42, body extent -2.6,-1.3 2.6,1.3, height 2.4
"SMA Bi Directional" [mm]
  rect 2x1.8 smd paste+0 mask+0.051: 1(-2,0) 2(2,0)
  silkscreen extent -2.3,-1.4 2.3,1.4, body extent -2.6,-1.3 2.6,1.3, height 2.4
SOD-323 [mm]
  rect 0.8x0.9 smd mask+0.055: 1(-1.15,0) 2(1.15,0)
  silkscreen extent -2.01,-0.79 0.94,0.79, body extent -1.3,-0.67 1.3,0.67, height 1.1
"SOD-323 (Bi-directional)" [mm]
  rect 0.8x0.9 smd mask+0.055: 1(-1.15,0) 2(1.15,0)
  silkscreen extent -0.94,-0.74 0.94,0.74, body extent -1.3,-0.67 1.3,0.67, height 1.1
"SOIC-8(0.154\", 3.90mm Width)" [mm]
  rect 1.55x0.6 smd: 1(-2.7,1.905) 2(-2.7,0.635) 3(-2.7,-0.635) 4(-2.7,-1.905) 5(2.7,-1.905) 6(2.7,-0.635) 7(2.7,0.635) 8(2.7,1.905)
  silkscreen extent -3.79,-2.51 1.8,2.51, body extent -3.01,-2.45 3.01,2.45, height 1.63
SOIC-14 [mm]
  rect 1.62x0.67 smd: 1(-2.7,3.81) 2(-2.7,2.54) 3(-2.7,1.27) 4(-2.7,0) 5(-2.7,-1.27) 6(-2.7,-2.54) 7(-2.7,-3.81) 8(2.7,-3.81) 9(2.7,-2.54) 10(2.7,-1.27) 11(2.7,0) 12(2.7,1.27) 13(2.7,2.54) 14(2.7,3.81)
  silkscreen extent -3.84,-4.37 1.88,4.37, body extent -3.01,-4.33 3.01,4.33, height 1.75
"Solder Bridge" [mil] "Solder Bridge ON"
  rect 30x35 smd: 1(-30,0) 2(30,0)
  silkscreen extent -50,-22 50,22
SOT-23 [mm] "TRANS NPN 40V 0.6A SOT23"
  rect 0.82x0.92 smd: 1(-0.95,-1) 2(0.95,-1) 3(0,1)
  silkscreen extent -1.68,-1.3 1.55,0.81, body extent -1.5,-1.25 1.5,1.25, height 1.05
"Test-point - 0.5mm" [mm]
  oct 1x1 smd: 1(0,0)
  silkscreen extent -0.68,-0.68 0.68,0.68
TF31-30S-0.5SH(800) [mm]
  rect 0.3x1.3 smd: 1(-7.25,1.625) 2(-6.75,1.625) 3(-6.25,1.625) 4(-5.75,1.625) 5(-5.25,1.625) 6(-4.75,1.625) 7(-4.25,1.625) 8(-3.75,1.625) 9(-3.25,1.625) 10(-2.75,1.625) 11(-2.25,1.625) 12(-1.75,1.625) 13(-1.25,1.625) 14(-0.75,1.625) 15(-0.25,1.625) 16(0.25,1.625) 17(0.75,1.625) 18(1.25,1.625) 19(1.75,1.625) 20(2.25,1.625) 21(2.75,1.625) 22(3.25,1.625) 23(3.75,1.625) 24(4.25,1.625) 25(4.75,1.625) 26(5.25,1.625) 27(5.75,1.625) 28(6.25,1.625) 29(6.75,1.625) 30(7.25,1.625)
  rect 1.9x2.2 smd: S1(9.2,-1.625) S2(-9.2,-1.625)
  silkscreen extent -9.65,-4.08 9.65,1.78, body extent -9.65,-4.06 9.65,1.69, height 2.02
TYPE-C-31-M-12_ [mm]
  rect 0.6x1.2 smd: A1/B12(-3.2,2.375) A4/B9(-2.4,2.375) B1/A12(3.2,2.375) B4/A9(2.4,2.375)
  rect 0.3x1.2 smd: A5(-1.25,2.375) A6(-0.25,2.375) A7(0.25,2.375) A8(1.25,2.375) B5(1.75,2.375) B6(0.75,2.375) B7(-0.75,2.375) B8(-1.75,2.375)
  round 0 hole 0.62 unplated: MH(-2.89,1.305) MH(2.89,1.305)
  oval 0.9x2 hole 0.6 slot 1.7 at 90 deg: S1(4.325,1.805) S4(-4.325,1.805)
  oval 0.9x1.7 hole 0.6 slot 1.4 at 90 deg: S2(4.325,-2.375) S3(-4.325,-2.375)
  silkscreen extent -4.44,-3.23 4.44,0.44, body extent -4.47,-5.01 4.47,2.89, height 3.31
U.FL-R-SMT-1(10) [mm]
  rect 1x1.05 smd: 1(0,-0.763)
  rect 1.05x2.2 smd: 2(-1.475,0.763) 3(1.475,0.763)
  silkscreen extent -1.3,-0.54 1.3,2.06, body extent -1.5,-0.84 1.5,2.26, height 1.25
VLCF5020T-220MR75-1 [mm]
  rect 2.6x4.9 smd paste+0 mask+0.051: 1(-1.9,0) 2(1.9,0)
  silkscreen extent -2.5,-2.7 2.5,2.7, body extent -2.65,-2.51 2.65,2.5, height 2
VRB1205S-10WR3 [mil]
  rect 60x60 hole 36: 1(-350,0)
  round 60 hole 36: 2(-250,0) 3(-150,0) 5(50,0) 6(150,0) 7(250,0) 8(350,0)
  silkscreen extent -423,-265 427,105, body extent -433,-268 433,106, height 472
WSON-6-EP(2x2) [mm]
  rect 0.45x0.4 smd paste+0 mask+0.051: 1(-0.975,0.65) 2(-0.975,0) 3(-0.975,-0.65) 4(0.975,-0.65) 5(0.975,0) 6(0.975,0.65)
  rect 1x1.6 smd paste+0 mask+0.051: 7(0,0)
  silkscreen extent -1.47,-1.05 1.05,1.05, body extent -1.01,-1 1.01,1, height 0.81

## Part data
C1: library part 25SVPF47M, "CAP ALUM POLY 47UF 20% 25V SMD", Capacitor Type=Aluminium, Case/Package=2626, ESR (Equivalent Series Resistance)=30mR, LCSC Part Number=C136280, Leakage Current=235uA, Manufacturer=Panasonic, Max Operating Temperature=105°C, Min Operating Temperature=-55°C, Package Shape=Cylindrical, Package Style=SMTMeter, Rated DC Voltage (URdc)=25V, Ripple Current=140mA, Tolerance  (fill in as +-)=20%, Category="Polymer Capacitors", ComponentLink1Description=https://datasheet.ciiva.com:443/pdfs/VipMasterIC/IC/PANA/PANA-S-A0008969958/PANA-S-A0008969958-1.pdf?src-supplier=IHS+Markit, ComponentLink1URL=https://datasheet.ciiva.com:443/pdfs/VipMasterIC/IC/PANA/PANA-S-A0008969958/PANA-S-A0008969958-1.pdf?src-supplier=IHS+Markit, ComponentLink2Description=https://datasheet.ciiva.com/48542/svpf-eng-ds-48542390.pdf?src-supplier=Distrelec, ComponentLink2URL=https://datasheet.ciiva.com/48542/svpf-eng-ds-48542390.pdf?src-supplier=Distrelec, ComponentLink3Description=https://datasheet.ciiva.com/25746/1734360-25746558.pdf?src-supplier=Farnell, ComponentLink3URL=https://datasheet.ciiva.com/25746/1734360-25746558.pdf?src-supplier=Farnell, ComponentLink4Description=https://datasheet.ciiva.com/22746/1734360-22746218.pdf?src-supplier=Element14, ComponentLink4URL=https://datasheet.ciiva.com/22746/1734360-22746218.pdf?src-supplier=Element14, ComponentLink5Description=https://datasheet.ciiva.com/24025/svpf-os-262415-24025725.pdf?src-supplier=Mouser, ComponentLink5URL=https://datasheet.ciiva.com/24025/svpf-os-262415-24025725.pdf?src-supplier=Mouser, Dielectric Material=Aluminium, Height=5.9mm, Item Type=Capacitor, Length=7.3mm, Manufacturer Part Number=25SVPF47M, Mounting Technology="Surface Mount", Packaging="Tape and Reel", Pins=2, Polarity=Polarized, Pricing 1="1000=0.43572, 2000=0.42658, 4000=0.41744, 6000=0.40830, 8000=0.39916 (USD)", Reach SVHC Compliant=Yes, RoHS=Yes, RoHS Compliant=Yes, Stock 1=1000, Supplier 1=Avnet, Supplier Part Number 1=25SVPF47M, Tan Delta=0.12, Termination=Flat, Tolerance (fill in as +-)=20%, Width=6.6mm
C2 C6: library part GRM188R61E106MA73D, "CAP CER 10UF 25V X5R 0603", Case Code (Imperial)=0603, Case Code (Metric)=1608, Dielectric=X5R, LCSC Part Number=C91606, Manufacturer=Murata, Max Operating Temperature=85°C, Min Operating Temperature=-55°C, Package Quantity=1, Tolerance=20%, Voltage=25V, Case/Package=0603, ComponentLink1Description=https://datasheet.ciiva.com/22776/c02e-22776427.pdf?src-supplier=Farnell, ComponentLink1URL=https://datasheet.ciiva.com/22776/c02e-22776427.pdf?src-supplier=Farnell, ComponentLink2Description=https://datasheet.ciiva.com/22619/c02e-22619674.pdf?src-supplier=Element14, ComponentLink2URL=https://datasheet.ciiva.com/22619/c02e-22619674.pdf?src-supplier=Element14, ComponentLink3Description=https://datasheet.ciiva.com/22776/608985-22776426.pdf?src-supplier=Farnell, ComponentLink3URL=https://datasheet.ciiva.com/22776/608985-22776426.pdf?src-supplier=Farnell, ComponentLink4Description=https://datasheet.ciiva.com/14906/partnumbering-e-01-14906431.pdf?src-supplier=Digikey, ComponentLink4URL=https://datasheet.ciiva.com/14906/partnumbering-e-01-14906431.pdf?src-supplier=Digikey, ComponentLink5Description=https://datasheet.ciiva.com/14906/partnumbering-e-01-14906429.pdf?src-supplier=Digikey, ComponentLink5URL=https://datasheet.ciiva.com/14906/partnumbering-e-01-14906429.pdf?src-supplier=Digikey, Construction=Flat, Depth=0.8mm, Height=0.8mm, Item Type=Capacitors, Lead Free=5697LeadFree, Length=1.6mm, Manufacturer Part Number=GRM188R61E106MA73D, Material=4241ConductorMaterial, Mounting Technology="Surface Mount", Packaging="Cut Tape", Pins=2, Pricing="1=0.18, 10=0.054, 50=0.054, 100=0.046, 1000=0.044, 10000=0.04 (USD)", Reach SVHC Compliant=No, RoHS=Yes, RoHS Compliant=Yes, Series=GRM, Stock=623875, Supplier=Mouser, Termination=SMD/SMT, Thickness=0.031inch, Voltage Rating=25V, Voltage Rating (DC)=25V, Weight=0.000222oz, Width=0.031inch
C3: library part C1608X7R1E105K080AB, "CAP CER 1UF 25V X7R 0603", Case Code (Imperial)=0603, Case Code (Metric)=1608, Dielectric=X7R, Dielectric Material=4241ConductorMaterial, Manufacturer=TDK, Max Operating Temperature=125°C, Min Operating Temperature=-55°C, Package Quantity=1, Tolerance=10%, Voltage=25V, Case/Package=0603, ComponentLink1Description=https://datasheet.ciiva.com/23802/1796654-23802776.pdf?src-supplier=Newark, ComponentLink1URL=https://datasheet.ciiva.com/23802/1796654-23802776.pdf?src-supplier=Newark, ComponentLink2Description=https://datasheet.ciiva.com/22725/1913358-22725530.pdf?src-supplier=Element14, ComponentLink2URL=https://datasheet.ciiva.com/22725/1913358-22725530.pdf?src-supplier=Element14, ComponentLink3Description=https://datasheet.ciiva.com/28693/mlcc-commercial-general-en-28693447.pdf?src-supplier=Element14, ComponentLink3URL=https://datasheet.ciiva.com/28693/mlcc-commercial-general-en-28693447.pdf?src-supplier=Element14, ComponentLink4Description=https://datasheet.ciiva.com/6290/tdkmlcccaprange-6290854.pdf?src-supplier=Digikey, ComponentLink4URL=https://datasheet.ciiva.com/6290/tdkmlcccaprange-6290854.pdf?src-supplier=Digikey, ComponentLink5Description=https://datasheet.ciiva.com/26834/getdatasheetpartid-727834-26834380.pdf?src-supplier=Verical, ComponentLink5URL=https://datasheet.ciiva.com/26834/getdatasheetpartid-727834-26834380.pdf?src-supplier=Verical, Construction=Flat, Depth=0.8mm, Height=0.8mm, Item Type=Capacitors, Lead Free="Lead Free", Length=1.6mm, Manufacturer Part Number=C1608X7R1E105K080AB, Material=4241ConductorMaterial, Mounting Technology="Surface Mount", Packaging="Tape and Reel", Pricing="1=0.18, 10=0.103, 50=0.0722, 100=0.0627, 500=0.04664, 1000=0.04163 (USD)", Radiation Hardening=No, Reach SVHC Compliant=No, RoHS=Yes, RoHS Compliant=Yes, Series=C, Stock=239206, Supplier=Digikey, Thickness=0.037inch, Voltage Rating=25V, Width=0.031inch
C4: library part CC0603JRX7R8BB104, "CAP CER 0.1UF 25V X7R 0603", Case Code (Imperial)=0603, Case Code (Metric)=1608, Dielectric=X7R, LCSC Part Number=C327087, Manufacturer=Yageo, Max Operating Temperature=125°C, Min Operating Temperature=-55°C, Tolerance=5%, Voltage Rating=25V, Case/Package=0603, ComponentLink1Description=https://datasheet.ciiva.com/11465/upy-gphc-x7r-6-3v-to-50v-8-11465031.pdf?src-supplier=Avnet, ComponentLink1URL=https://datasheet.ciiva.com/11465/upy-gphc-x7r-6-3v-to-50v-8-11465031.pdf?src-supplier=Avnet, Construction=Flat, Halogen Free="Halogen Free", Height=0.8mm, Item Type=Capacitors, Lead Free="Lead Free", Length=1.6mm, Manufacturer Part Number=CC0603JRX7R8BB104, Mounting Technology="Surface Mount", Packaging="Tape and Reel", Pricing="1=0.1, 10=0.057, 50=0.039, 100=0.0335, 500=0.02436, 1000=0.0215 (USD)", RoHS=Yes, RoHS Compliant=Yes, Series=CC, Stock=448767, Supplier=Digikey, Termination=SMD/SMT, Thickness=0.035inch, Voltage Rating (DC)=25V, Weight=7.1E-05oz, Width=0.031inch
C5: library part GRM21BZ71A226ME15L, "CAP CER 22UF 10V X7R 0805", LCSC Part Number=C907991, Manufacturer=Murata, Max Operating Temperature=125°C, Min Operating Temperature=-55°C, Package=0805, Supplier Part Number=490-GRM21BZ71A226ME15LCT-ND, Tolerance=20%, Voltage Rating=10V, Category="Ceramic Capacitors", ComponentLink1Description=https://datasheet.octopart.com/GRM21BZ71A226ME15L-Murata-datasheet-165579666.pdf?src-supplier=TME, ComponentLink1URL=https://datasheet.octopart.com/GRM21BZ71A226ME15L-Murata-datasheet-165579666.pdf?src-supplier=TME, ComponentLink2Description=LCSC, ComponentLink2URL=https://www.lcsc.com/product-detail/Multilayer-Ceramic-Capacitors-MLCC-SMD-SMT_Murata-Electronics-GRM21BZ71A226ME15L_C907991.html, Height=1.45mm, Item Type=Capacitor, Length=2mm, Manufacturer Part Number=GRM21BZ71A226ME15L, Material=4241ConductorMaterial, Pricing="1=0.39, 10=0.259, 50=0.191, 100=0.1556, 500=0.12282, 1000=0.10372 (USD)", RoHS=Yes, Stock=49126, Supplier=Digi-Key, Thickness=1.25mm, Width=1.25mm
C7 C9 C10 C12 C14 C15 C17: library part CC0402KRX5R7BB104, "CAP CER 0.1UF 16V X5R 0402", Case Code (Imperial)=0402, Case Code (Metric)=1005, Dielectric=X5R, LCSC Part Number=C106204, Manufacturer=Yageo, Max Operating Temperature=85°C, Min Operating Temperature=-55°C, Package Quantity=1, Resistor Type=Ceramic, Supplier Part Number 1=603-CC402KRX5R7BB104, Tolerance=10%, Voltage Rating=16V, Capacitance=100nF, Case/Package=0402, Category="Ceramic Capacitors", ComponentLink1Description=https://datasheet.ciiva.com/155/mlccorderingcode-155879.pdf?src-supplier=Digi-Key, ComponentLink1URL=https://datasheet.ciiva.com/155/mlccorderingcode-155879.pdf?src-supplier=Digi-Key, ComponentLink2Description=https://datasheet.ciiva.com/155/mlccorderingcode-155878.pdf?src-supplier=Digi-Key, ComponentLink2URL=https://datasheet.ciiva.com/155/mlccorderingcode-155878.pdf?src-supplier=Digi-Key, ComponentLink3Description=https://datasheet.ciiva.com/155/mlccorderingcode-155880.pdf?src-supplier=Digi-Key, ComponentLink3URL=https://datasheet.ciiva.com/155/mlccorderingcode-155880.pdf?src-supplier=Digi-Key, ComponentLink4Description=https://datasheet.ciiva.com/11464/upy-gphc-x5r-4v-to-50v-12-11464869.pdf?src-supplier=Avnet, ComponentLink4URL=https://datasheet.ciiva.com/11464/upy-gphc-x5r-4v-to-50v-12-11464869.pdf?src-supplier=Avnet, Construction=Flat, Depth=0.5mm, Halogen Free="Halogen Free", Height=0.5mm, Lead Free="Lead Free", Length=1mm, Manufacturer Part Number=CC0402KRX5R7BB104, Mount="Surface Mount", Number of Pins=2, Packaging="Tape and Reel", Pricing 1="1=0.10000, 10=0.02300, 50=0.02300, 100=0.01100, 1000=0.00600, 10000=0.00400 (USD)", Radiation Hardening=No, REACH SVHC=Unknown, RoHS=Yes, RoHS Compliant=Yes, Series=CC, Stock 1=936792, Supplier 1=Mouser, Termination=SMD/SMT, Thickness=0.022inch, Voltage Rating (DC)=16V, Width=0.02inch
C8: library part GRM158R61A226ME15D, "CAP CER 22UF 10V X5R 0402", Case/Package=343Case, Dielectric=1537DielectricType, LCSC Part Number=C3845593, Manufacturer=Murata, Max Operating Temperature=85°C, Min Operating Temperature=-55°C, Supplier Part Number=81-GRM158R61A226ME5D, Tolerance=20%, Voltage Rating=10V, Category="Ceramic Capacitors", Height=800um, Item Type=Capacitor, Length=1mm, Manufacturer Part Number=GRM158R61A226ME15D, Material=4241ConductorMaterial, Pricing="1=0.46, 10=0.225, 50=0.225, 100=0.146, 1000=0.124, 10000=0.106 (USD)", RoHS=Yes, Stock=328944, Supplier=Mouser, Thickness=800um, Voltage Rating (DC)=10V, Width=500um
C11 C13 C24: library part CC0402KRX5R6BB475, "CAP CER 4.7UF 10V X5R 0402", Case Code (Imperial)=0402, Case Code (Metric)=1005, LCSC Part Number=C326586, Manufacturer=Yageo, Max Operating Temperature=85°C, Min Operating Temperature=-55°C, Supplier Part Number 1=3871698, Tolerance=10%, Voltage Rating=10V, Capacitance=4.7uF, Case/Package=0402, Category="Ceramic Capacitors", ComponentLink1Description=http://www.yageo.com/documents/recent/UPY-GPHC_X5R_4V-to-50V_25.pdf?src-supplier=Digi-Key, ComponentLink1URL=http://www.yageo.com/documents/recent/UPY-GPHC_X5R_4V-to-50V_25.pdf?src-supplier=Digi-Key, Manufacturer Part Number=CC0402KRX5R6BB475, Mount="Surface Mount", Packaging="Cut Tape", Pricing 1="10000=0.02310, 50000=0.02100 (GBP)", RoHS=Yes, RoHS Compliant=Yes, Stock 1=20000, Supplier 1=Farnell
C16 C18: library part CC0402MRX5R6BB106, "CAP CER 10UF 10V X5R 0402", Case Code (Imperial)=0402, Case Code (Metric)=1005, LCSC Part Number=C962143, Manufacturer=Yageo, Max Operating Temperature=85°C, Min Operating Temperature=-55°C, Supplier Part Number 1=6097631, Tolerance=20%, Voltage Rating=10V, Capacitance=10uF, Case/Package=0402, Category="Ceramic Capacitors", ComponentLink1Description=http://www.yageo.com/documents/recent/UPY-GPHC_X5R_4V-to-50V_25.pdf?src-supplier=Digi-Key, ComponentLink1URL=http://www.yageo.com/documents/recent/UPY-GPHC_X5R_4V-to-50V_25.pdf?src-supplier=Digi-Key, Item Type=Capacitor, Manufacturer Part Number=CC0402MRX5R6BB106, Mount="Surface Mount", Packaging="Tape and Reel", Pricing 1="10000=0.02650, 20000=0.02590, 30000=0.02550, 40000=0.02530, 50000=0.02450 (USD)", RoHS=Yes, RoHS Compliant=Yes, Stock 1=80000, Supplier 1="Future Electronics"
C19 C20 C25 C33 C35: library part GRM155R71H104ME14D, "CAP CER 0.1UF 50V X7R 0402", Capacitance=100nF, Case/Package=0402, LCSC Part Number=C182412, Manufacturer=Murata, Max Operating Temperature=125°C, Min Operating Temperature=-55°C, Tolerance=20%, Voltage Rating=50V, Category="Ceramic Capacitors", ComponentLink1Description=http://www.mouser.com/ds/2/281/c02e-2905.pdf?src-supplier=Mouser, ComponentLink1URL=http://www.mouser.com/ds/2/281/c02e-2905.pdf?src-supplier=Mouser, ComponentLink2Description=http://search.murata.co.jp/Ceramy/image/img/A01X/G101/ENG/GRM155R71H104ME14-01.pdf?src-supplier=Digi-Key, ComponentLink2URL=http://search.murata.co.jp/Ceramy/image/img/A01X/G101/ENG/GRM155R71H104ME14-01.pdf?src-supplier=Digi-Key, ComponentLink3Description=http://psearch.en.murata.com/capacitor/product/GRM155R71H104ME14%23.pdf?src-supplier=Avnet, ComponentLink3URL=http://psearch.en.murata.com/capacitor/product/GRM155R71H104ME14%23.pdf?src-supplier=Avnet, Item Type=Capacitor, Length=0.039inch, Manufacturer Part Number=GRM155R71H104ME14D, Mount="Surface Mount", Packaging="Cut Tape", Pricing 1="10000=0.00444, 20000=0.00420, 40000=0.00396, 60000=0.00372, 80000=0.00348, 100000=0.00324, 1000000=0.00300 (USD)", RoHS=Yes, RoHS Compliant=Yes, Stock 1=100000, Supplier 1=Avnet, Supplier Part Number 1=GRM155R71H104ME14D, Thickness=0.022inch, Width=0.02inch
C21 C22: library part CL10A105KB8NNNC, "CAP CER 1UF 50V X5R 0603", Case Code (Imperial)=0603, Case Code (Metric)=1608, Dielectric=X5R, LCSC Part Number=C15849, Manufacturer=Samsung, Max Operating Temperature=85°C, Min Operating Temperature=-55°C, Tolerance=10%, Voltage Rating=50V, Case/Package=0603, Category="Ceramic Capacitors", ComponentLink1Description=https://datasheet.ciiva.com/26877/getdatasheetpartid-753736-26877879.pdf?src-supplier=Verical, ComponentLink1URL=https://datasheet.ciiva.com/26877/getdatasheetpartid-753736-26877879.pdf?src-supplier=Verical, Depth=0.8mm, Item Type=Capacitor, Length=1.6mm, Manufacturer Part Number=CL10A105KB8NNNC, Material=4241ConductorMaterial, Mounting Technology="Surface Mount", Packaging="Tape and Reel", Pricing="4000=0.01632, 8000=0.01595, 16000=0.01557, 24000=0.0152, 32000=0.01482 (USD)", Radiation Hardening=No, RoHS=Yes, RoHS Compliant=Yes, Series=CL, Stock=780446, Supplier=Avnet, Supplier Part Number=CL10A105KB8NNNC, Voltage Rating (DC)=50V
C23: library part CC0402KRX5R8BB224, "CAP CER 0.22UF 25V X5R 0402", Case/Package=0402, Dielectric=X5R, LCSC Part Number=C326836, Manufacturer=Yageo, Max Operating Temperature=85°C, Min Operating Temperature=-55°C, Supplier Part Number 1=603-CC402KRX5R8BB224, Tolerance=10%, Voltage Rating=25V, Capacitance=220nF, ComponentLink1Description=http://www.yageo.com/documents/recent/UPY-GPHC_X5R_4V-to-50V_25.pdf?src-supplier=Digi-Key, ComponentLink1URL=http://www.yageo.com/documents/recent/UPY-GPHC_X5R_4V-to-50V_25.pdf?src-supplier=Digi-Key, ComponentLink2Description=https://www.yageo.com/upload/media/product/productsearch/datasheet/mlcc/UPY-GPHC_X5R_4V-to-50V_26.pdf?src-supplier=Digi-Key, ComponentLink2URL=https://www.yageo.com/upload/media/product/productsearch/datasheet/mlcc/UPY-GPHC_X5R_4V-to-50V_26.pdf?src-supplier=Digi-Key, ComponentLink3Description=http://www.yageo.com/documents/recent/UPY-GPHC_X5R_4V-to-50V_23.pdf?src-supplier=Digi-Key, ComponentLink3URL=http://www.yageo.com/documents/recent/UPY-GPHC_X5R_4V-to-50V_23.pdf?src-supplier=Digi-Key, Halogen Free="Halogen Free", Item Type=Capacitors, Lead Free="Lead Free", Length=0.039inch, Manufacturer Part Number=CC0402KRX5R8BB224, Mount="Surface Mount", Packaging="Tape and Reel", Pricing 1="1=0.10000, 10=0.03300, 50=0.03300, 100=0.02700, 1000=0.01500, 10000=0.01300 (USD)", RoHS=Yes, RoHS Compliant=Yes, Stock 1=61266, Supplier 1=Mouser, Thickness=0.022inch, Voltage Rating (DC)=25V, Width=0.02inch
C26: library part CC0603JRNPO9BN101, "CAP CER 100PF 50V C0G/NPO 0603", Case Code (Imperial)=0603, Case Code (Metric)=1608, Dielectric=C0G, Insulation Resistance=100GR, LCSC Part Number=C14665, Manufacturer=Yageo, Max Operating Temperature=125°C, Min Operating Temperature=-55°C, Package Quantity=1, Resistor Type=Ceramic, Temperature Coefficient=30ppm/°C, Tolerance=5%, Voltage=50V, Capacitance=100pF, Case/Package=0603, Category="Ceramic Capacitors", ComponentLink1Description=https://datasheet.ciiva.com/11786/0900766b8079c870-11786060.pdf?src-supplier=RSComponents, ComponentLink1URL=https://datasheet.ciiva.com/11786/0900766b8079c870-11786060.pdf?src-supplier=RSComponents, ComponentLink2Description=https://datasheet.ciiva.com/7978/1443161-7978127.pdf?src-supplier=Element14, ComponentLink2URL=https://datasheet.ciiva.com/7978/1443161-7978127.pdf?src-supplier=Element14, ComponentLink3Description=https://datasheet.ciiva.com/28450/1443161-28450457.pdf?src-supplier=Element14, ComponentLink3URL=https://datasheet.ciiva.com/28450/1443161-28450457.pdf?src-supplier=Element14, ComponentLink4Description=https://datasheet.ciiva.com/46430/1835847-46430151.pdf?src-supplier=Element14, ComponentLink4URL=https://datasheet.ciiva.com/46430/1835847-46430151.pdf?src-supplier=Element14, ComponentLink5Description=https://datasheet.ciiva.com/144/mlccorderingcode-144629.pdf?src-supplier=Digi-Key, ComponentLink5URL=https://datasheet.ciiva.com/144/mlccorderingcode-144629.pdf?src-supplier=Digi-Key, ComponentLink6Description=https://datasheet.ciiva.com/144/mlccorderingcode-144628.pdf?src-supplier=Digi-Key, ComponentLink6URL=https://datasheet.ciiva.com/144/mlccorderingcode-144628.pdf?src-supplier=Digi-Key, ComponentLink7Description=https://datasheet.ciiva.com/144/mlccorderingcode-144630.pdf?src-supplier=Digi-Key, ComponentLink7URL=https://datasheet.ciiva.com/144/mlccorderingcode-144630.pdf?src-supplier=Digi-Key, ComponentLink8Description=https://datasheet.ciiva.com/11464/upy-gp-np0-16v-to-50v-8-11464725.pdf?src-supplier=Avnet, ComponentLink8URL=https://datasheet.ciiva.com/11464/upy-gp-np0-16v-to-50v-8-11464725.pdf?src-supplier=Avnet, ComponentLink9Description=https://datasheet.ciiva.com/26829/getdatasheetpartid-403525-26829372.pdf?src-supplier=Verical, ComponentLink9URL=https://datasheet.ciiva.com/26829/getdatasheetpartid-403525-26829372.pdf?src-supplier=Verical, Depth=0.8mm, Height=0.8mm, Lead Free="Lead Free", Length=1.6mm, Manufacturer Part Number=CC0603JRNPO9BN101, Mount="Surface Mount", Number of Pins=2, Packaging="Tape and Reel", Pricing 1="1=0.06030, 10=0.04400, 25=0.02170, 100=0.01580, 250=0.01330, 500=0.01300, 1000=0.01150, 3000=0.01010, 6000=0.00680 (USD)", Radiation Hardening=No, REACH SVHC=Unknown, RoHS=Yes, RoHS Compliant=Yes, Series=CC, Stock 1=10744, Supplier 1="Arrow Electronics", Supplier Part Number 1=CC0603JRNPO9BN101, Termination=SMD/SMT, Thickness=0.035inch, Voltage Rating=50V, Voltage Rating (DC)=50V, Width=0.8mm
C27 C29 C80: library part CC0402KRX5R6BB104, "CAP CER 0.1UF 10V X5R 0402", Capacitance=100nF, Case Code (Imperial)=0402, Case Code (Metric)=1005, Dielectric=X5R, Insulation Resistance=10GR, LCSC Part Number=C129131, Manufacturer=Yageo, Max Operating Temperature=85°C, Min Operating Temperature=-55°C, Package Quantity=1, Supplier Part Number 1=311-1336-1-ND, Tolerance=10%, Voltage Rating=10V, Case/Package=0402, Category="Ceramic Capacitors", ComponentLink1Description=https://datasheet.ciiva.com/144/mlccorderingcode-144029.pdf?src-supplier=Digi-Key, ComponentLink1URL=https://datasheet.ciiva.com/144/mlccorderingcode-144029.pdf?src-supplier=Digi-Key, ComponentLink2Description=https://datasheet.ciiva.com/144/mlccorderingcode-144028.pdf?src-supplier=Digi-Key, ComponentLink2URL=https://datasheet.ciiva.com/144/mlccorderingcode-144028.pdf?src-supplier=Digi-Key, ComponentLink3Description=https://datasheet.ciiva.com/144/mlccorderingcode-144030.pdf?src-supplier=Digi-Key, ComponentLink3URL=https://datasheet.ciiva.com/144/mlccorderingcode-144030.pdf?src-supplier=Digi-Key, ComponentLink4Description=https://datasheet.ciiva.com/7978/1359354-7978091.pdf?src-supplier=Element14, ComponentLink4URL=https://datasheet.ciiva.com/7978/1359354-7978091.pdf?src-supplier=Element14, ComponentLink5Description=https://datasheet.ciiva.com/11587/upy-gphc-x5r-4v-to-50v-12-11587302.pdf?src-supplier=Avnet, ComponentLink5URL=https://datasheet.ciiva.com/11587/upy-gphc-x5r-4v-to-50v-12-11587302.pdf?src-supplier=Avnet, Depth=0.5mm, Dissipation Factor=5%, Halogen Free="Halogen Free", Height=0.5mm, Item Type=Capacitor, Lead Free="Lead Free", Length=1mm, Manufacturer Part Number=CC0402KRX5R6BB104, Mount="Surface Mount", Number of Pins=2, Packaging="Tape and Reel", Pricing 1="1=0.10000, 10=0.02700, 50=0.01500, 100=0.01220, 500=0.00874, 1000=0.00687, 2500=0.00625, 5000=0.00575 (USD)", Radiation Hardening=No, REACH SVHC="No SVHC", RoHS=Yes, RoHS Compliant=Yes, Series=CC, Stock 1=6385580, Supplier 1=Digi-Key, Termination=SMD/SMT, Thickness=0.022inch, Voltage Rating (DC)=10V, Width=0.02inch
C28: library part RVT1E100M0405, "CAP ALUM 10uF 25V SMD", LCSC Part Number=C970655, Manufacturer=ROQANG, Operating Temperature=-45℃~+105℃, Rated Voltage=25V, Tolerance=±20%, Capacitance=10uF, ComponentLink1Description=LCSC, ComponentLink1URL=https://www.lcsc.com/product-detail/Aluminum-Electrolytic-Capacitors-SMD_10uF-25V-20_C72484.html, Item Type=Capacitor, L=5.4mm, Manufacturer Part Number=RVT1E100M0405, φD=4mm
C30: library part CC0402KRX7R8BB333, "CAP CER 0.033UF 25V X7R 0402", Case Code (Imperial)=0402, Case Code (Metric)=1005, Dielectric=X7R, LCSC Part Number=C326974, Manufacturer=Yageo, Max Operating Temperature=125°C, Min Operating Temperature=-55°C, Supplier Part Number=4094394, Temperature Coefficient=30ppm/°C, Tolerance=10%, Voltage Rating=25V, Case/Package=0402, ComponentLink1Description=https://datasheet.ciiva.com/13264/upy-gphc-x7r-6-3v-to-50v-8-12304-13264253.pdf?src-supplier=Mouser, ComponentLink1URL=https://datasheet.ciiva.com/13264/upy-gphc-x7r-6-3v-to-50v-8-12304-13264253.pdf?src-supplier=Mouser, Halogen Free="Halogen Free", Item Type=Capacitor, Lead Free="Lead Free", Length=0.039inch, Manufacturer Part Number=CC0402KRX7R8BB333, Material=4241ConductorMaterial, Mounting Technology="Surface Mount", Packaging="Tape and Reel", Pricing="10000=0.004, 40000=0.0038, 150000=0.0036, 250000=0.0035, 500000=0.0033 (USD)", RoHS=Yes, RoHS Compliant=Yes, Series=CC, Stock=50000, Supplier="Future Electronics", Termination=SMD/SMT, Thickness=0.022inch, Voltage Rating (DC)=25V, Weight=2.3E-05oz, Width=0.02inch